# Altium PCB PCB1.PcbDoc (part 1 of 5)
Units mm, origin at the board's own origin, x right, y up, seen from the top; angles counter-clockwise.
Board outline 130 x 90 mm, 4 copper layers (Top Layer, Int 1 (GND), Int 2 (PWR), Bottom Layer), stack 1.466 mm thick; 419 components, 281 nets, 1355 pads, 522 vias.
Unrouted connection lines stored in the file: 26.
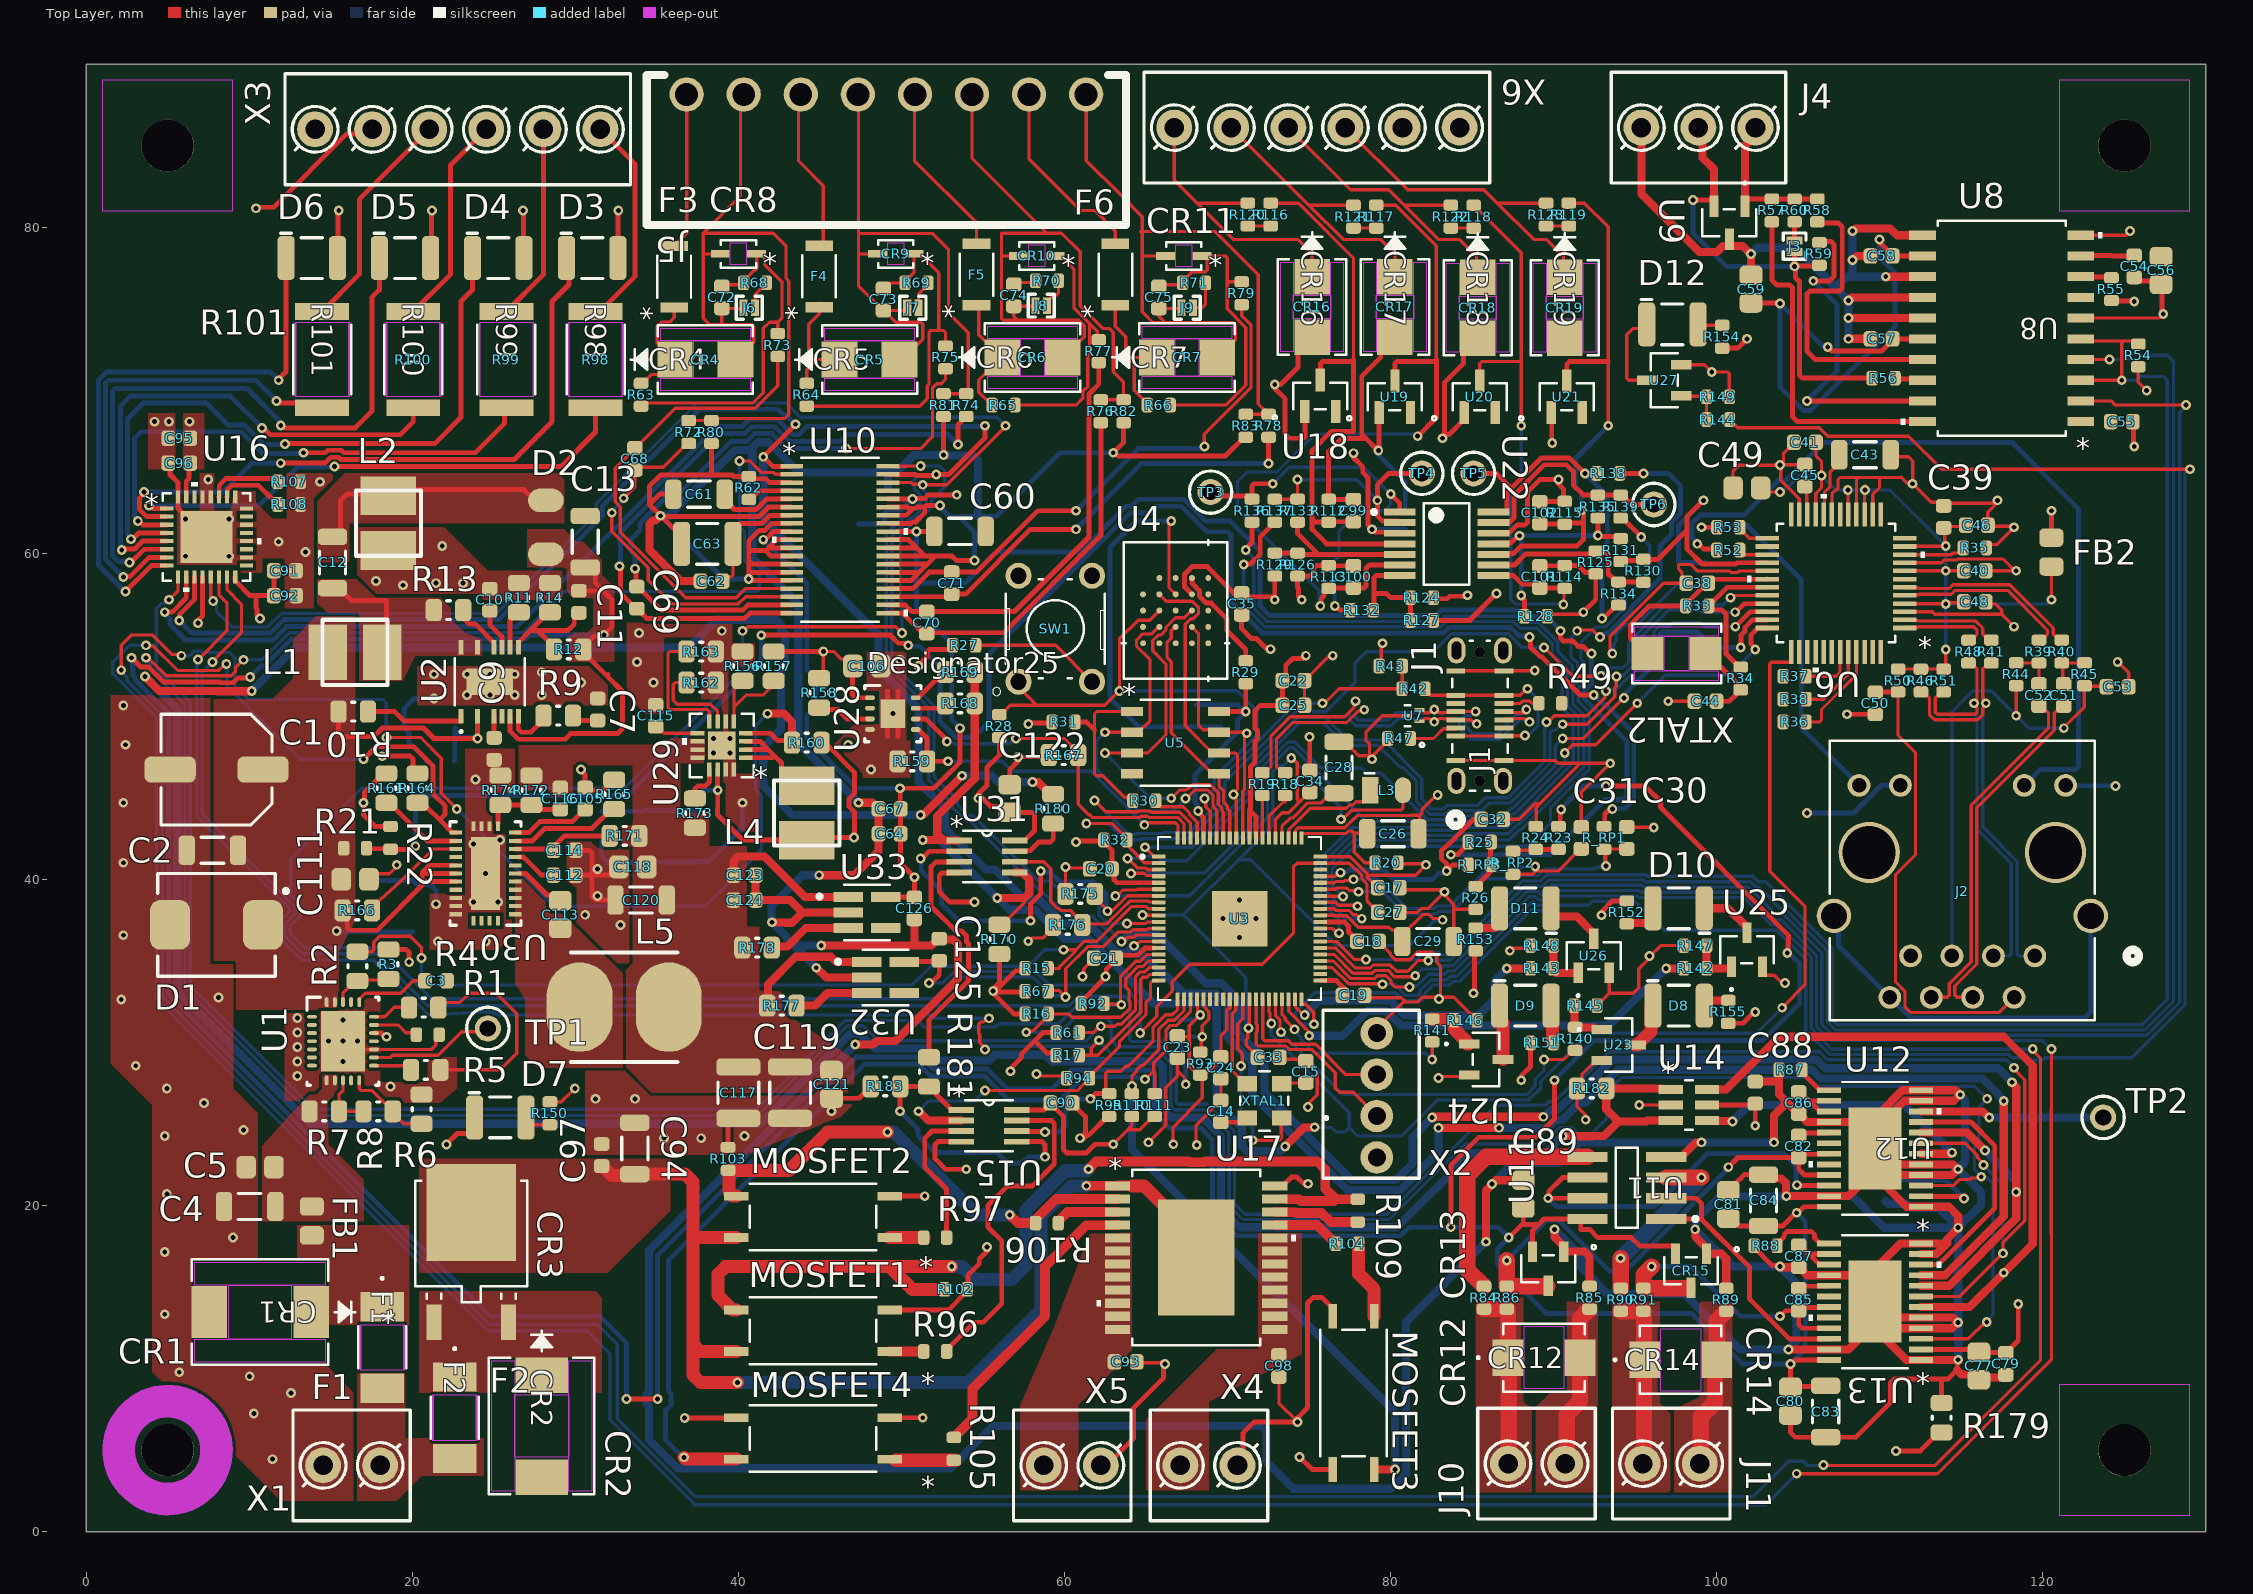
[diagram p0: Top Layer view]
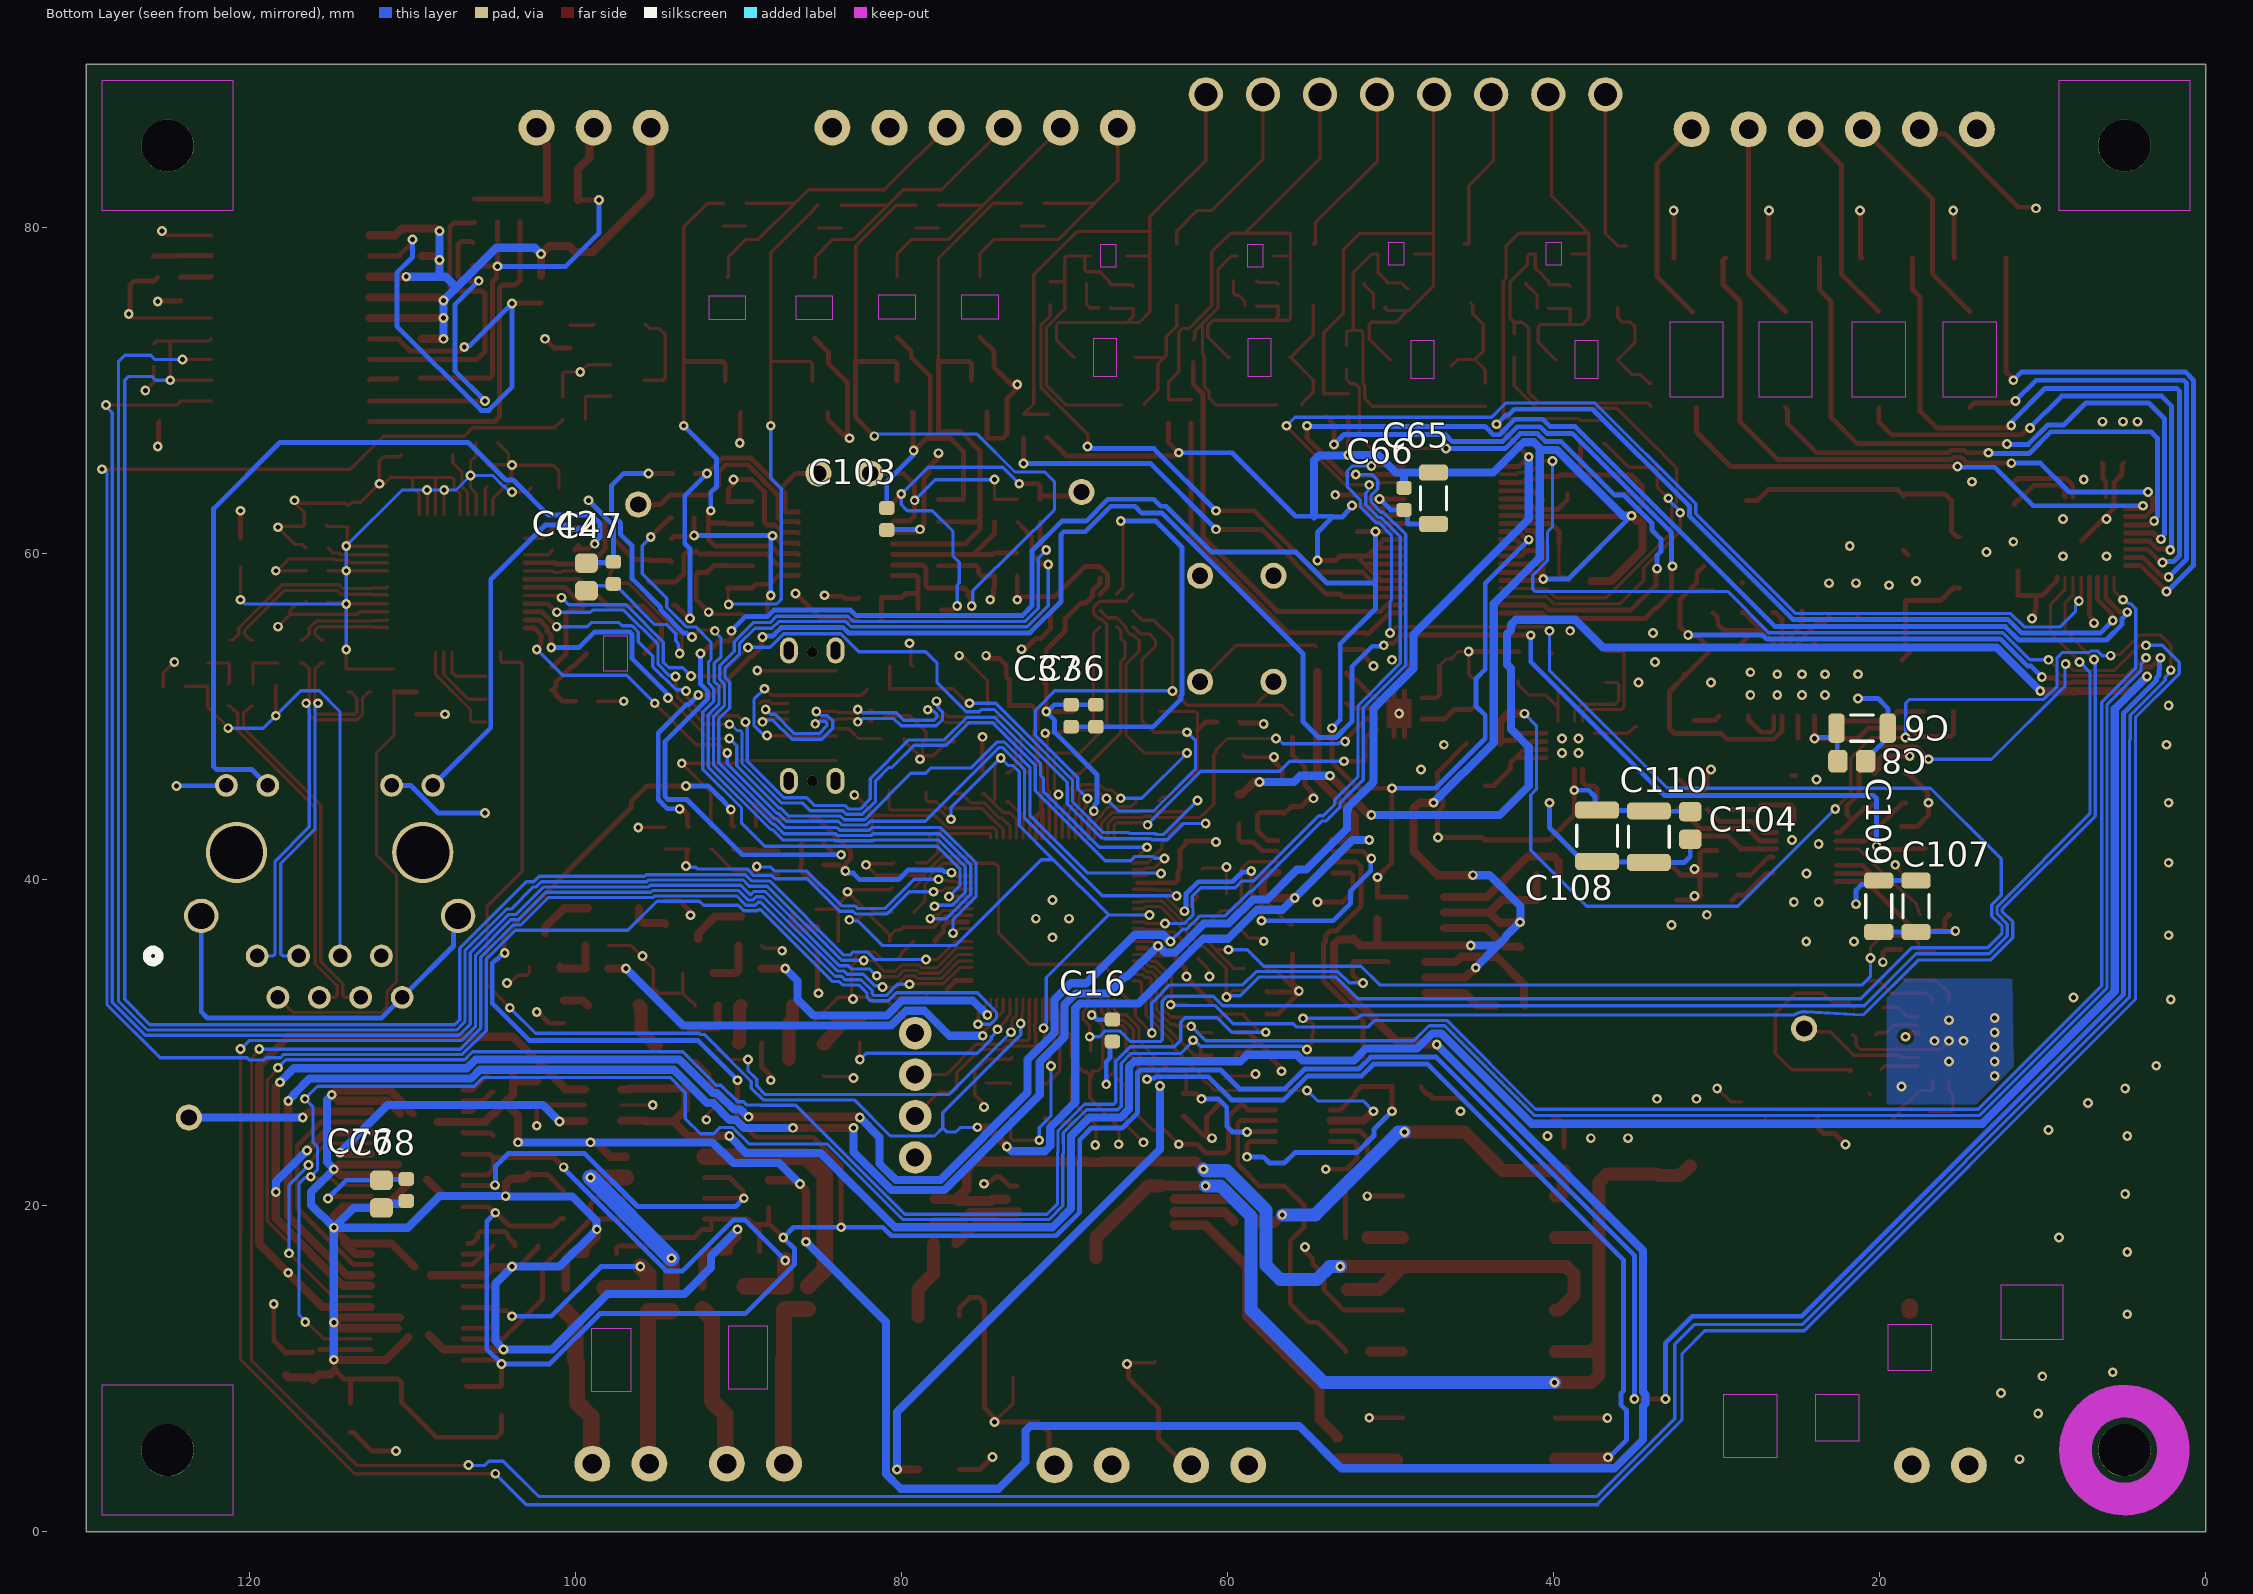
[diagram p1: Bottom Layer view, seen from below]
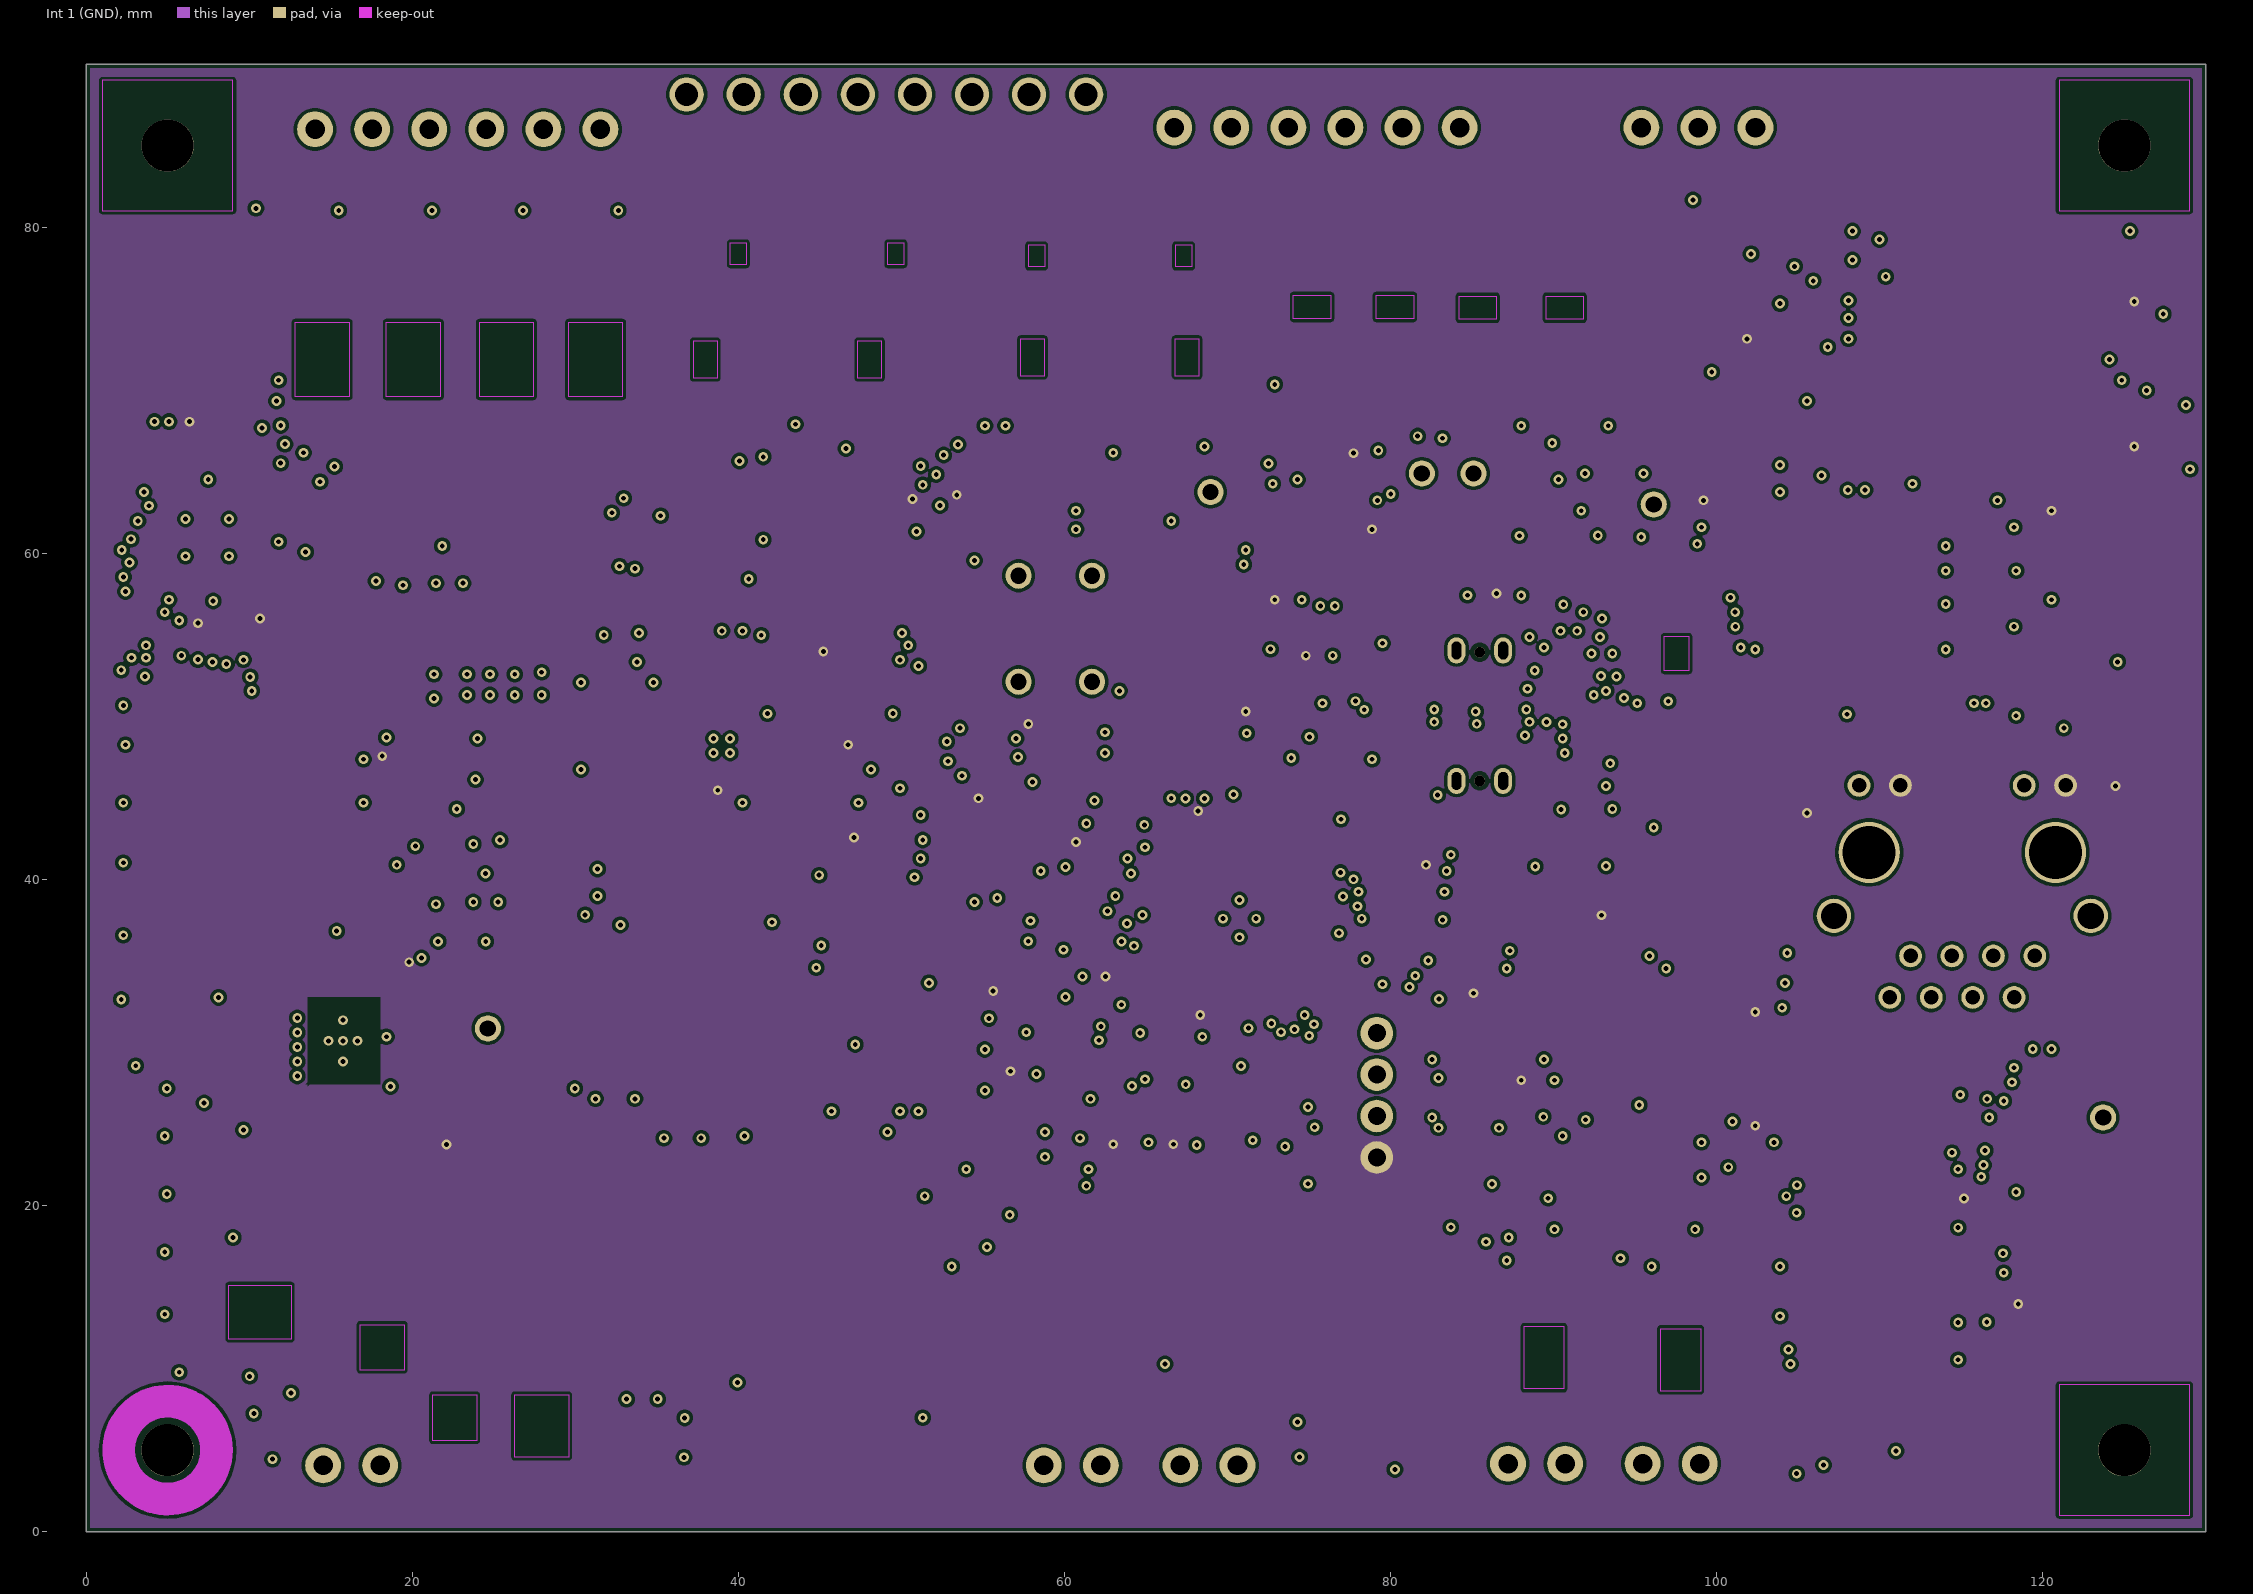
[diagram p2: Int 1 (GND)]
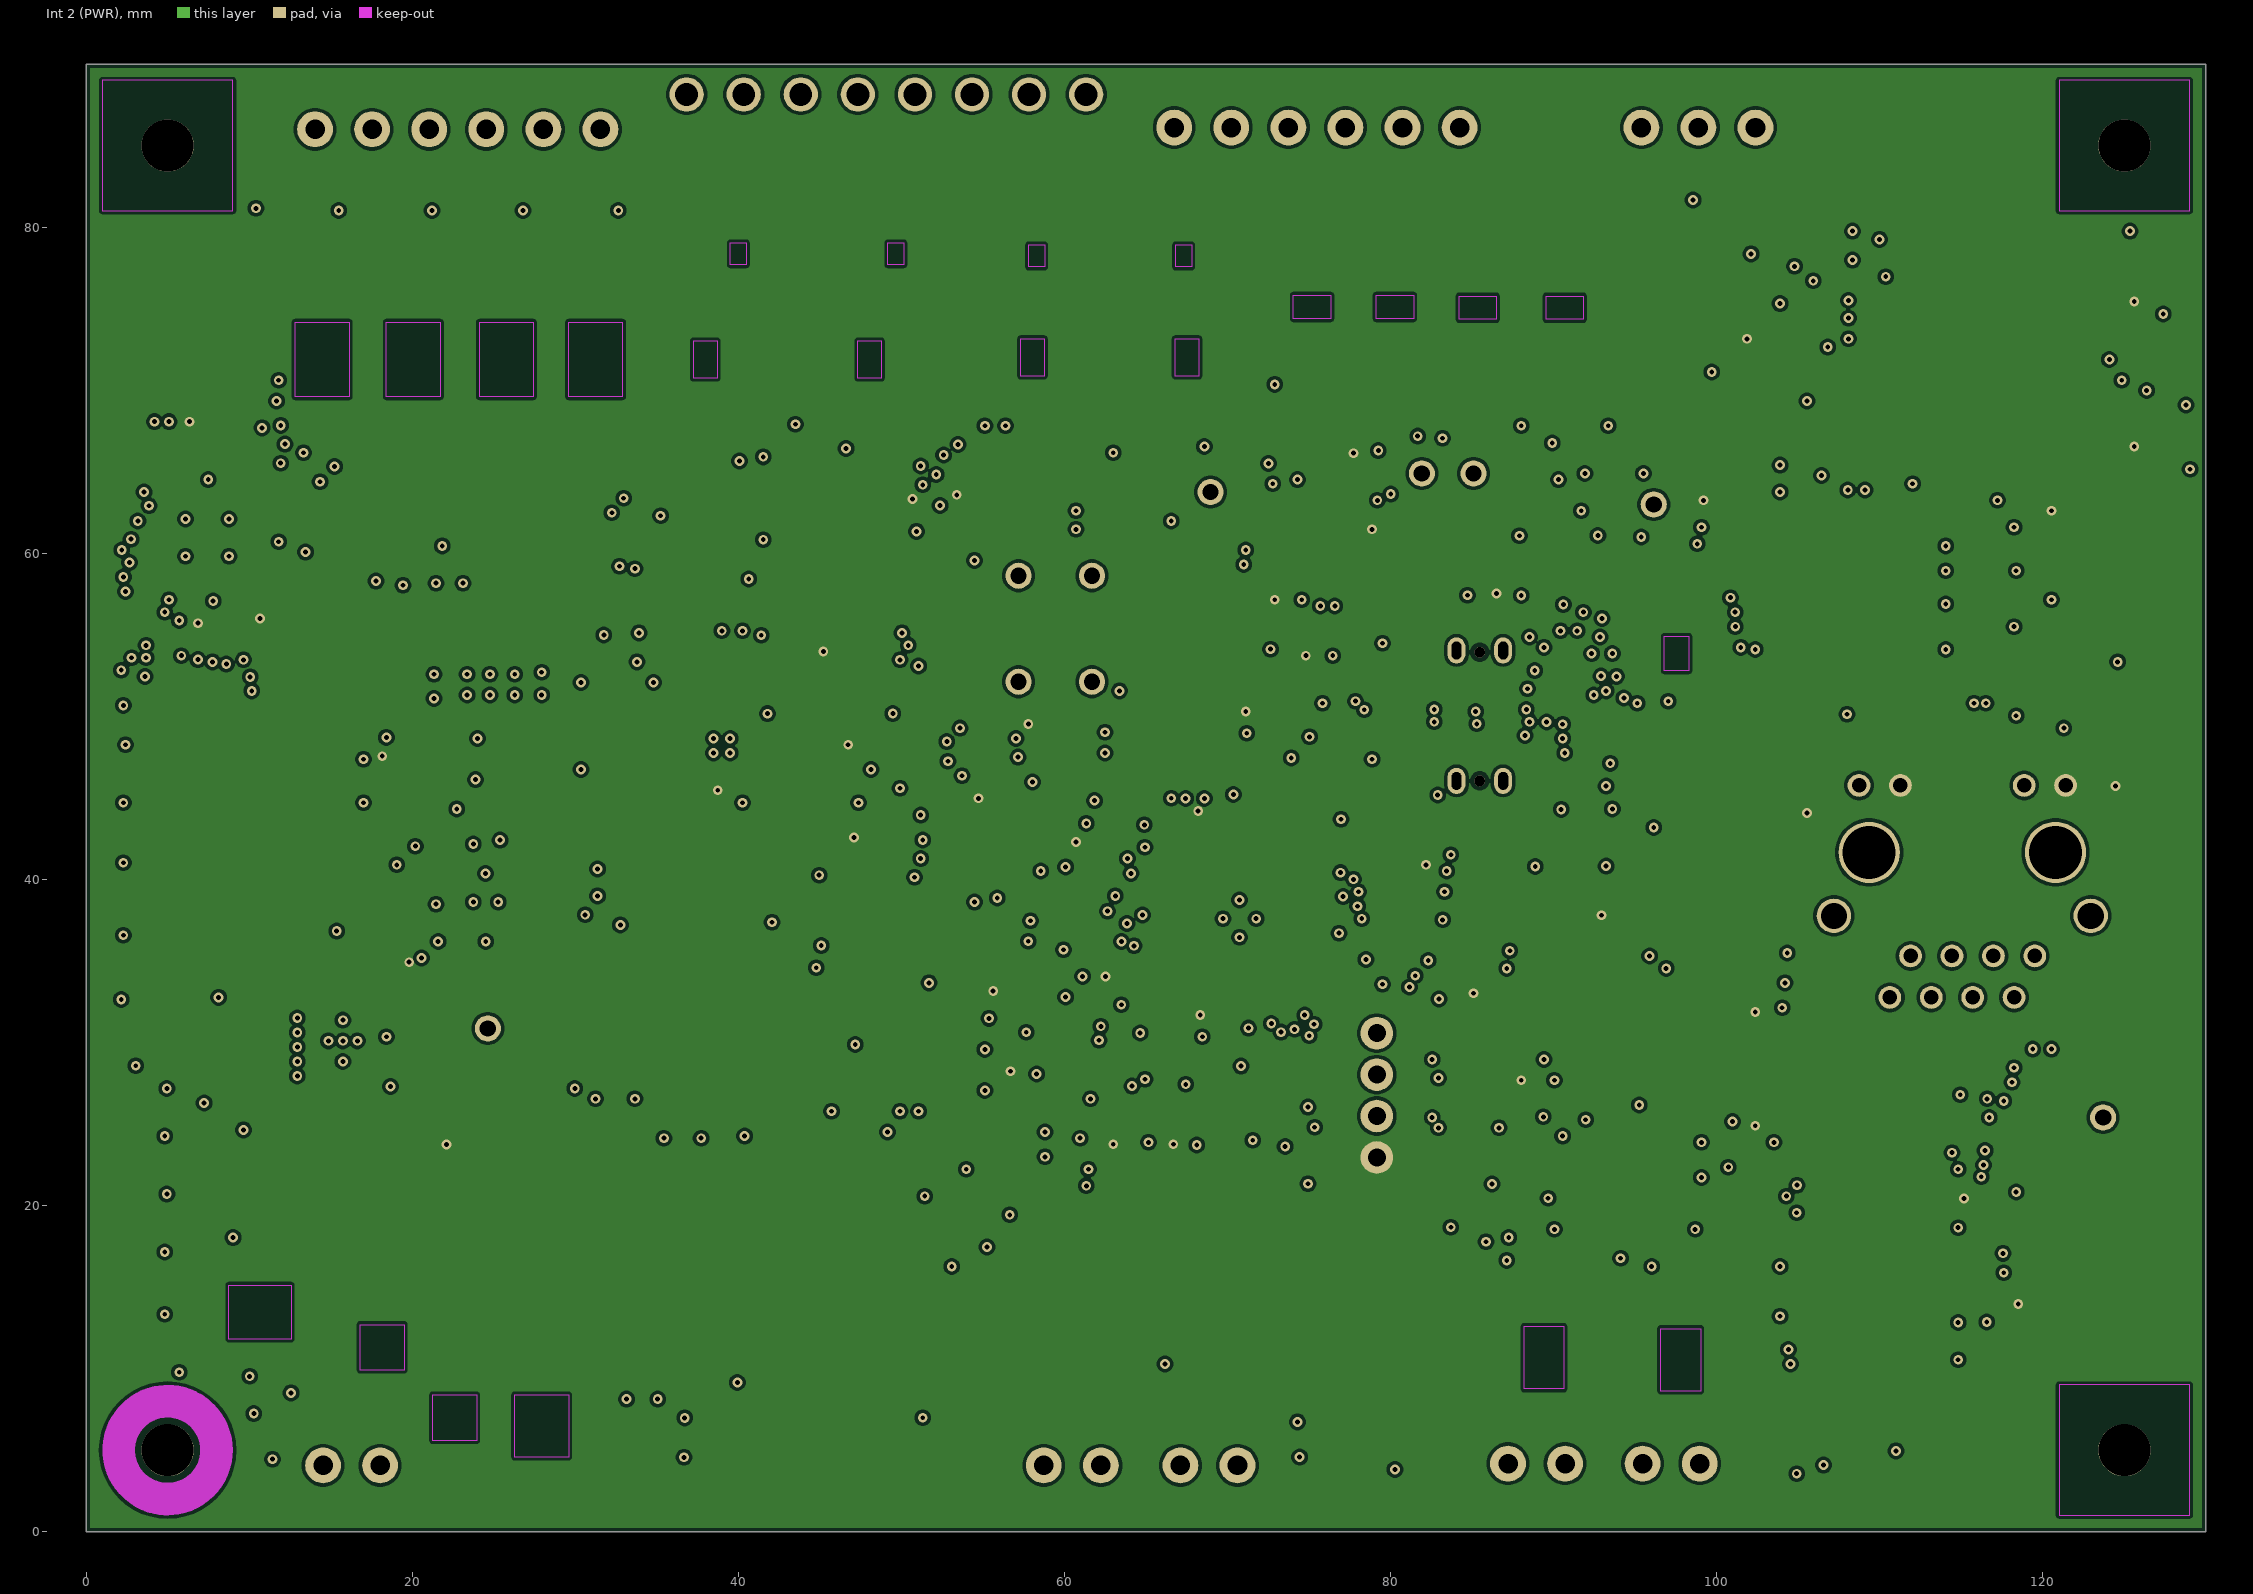
[diagram p3: Int 2 (PWR)]
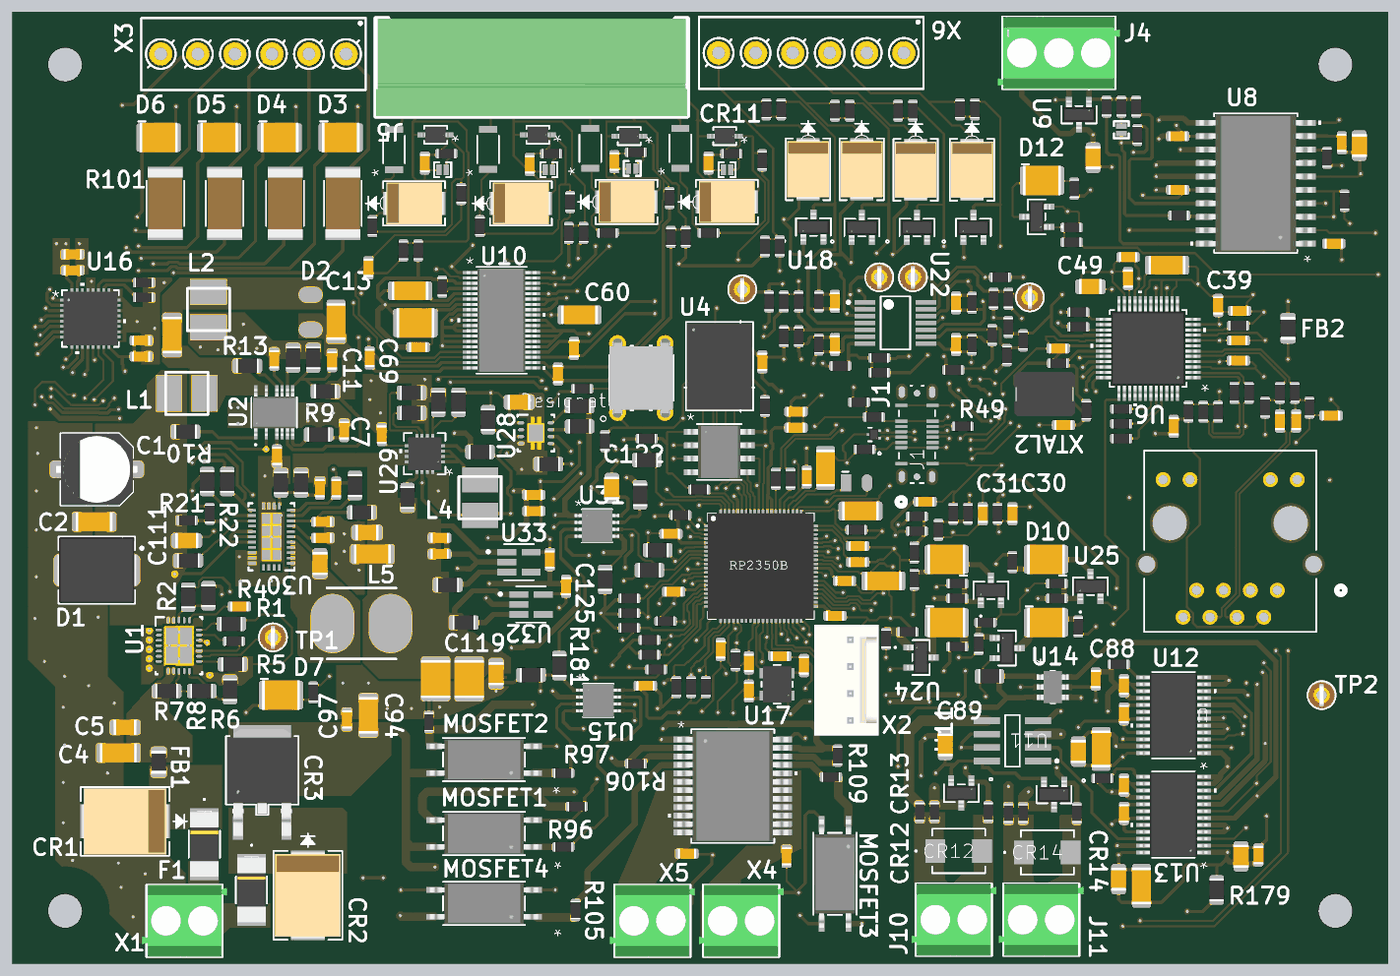
[diagram p8: 3D render of the assembled board from above, using the file's embedded part models]
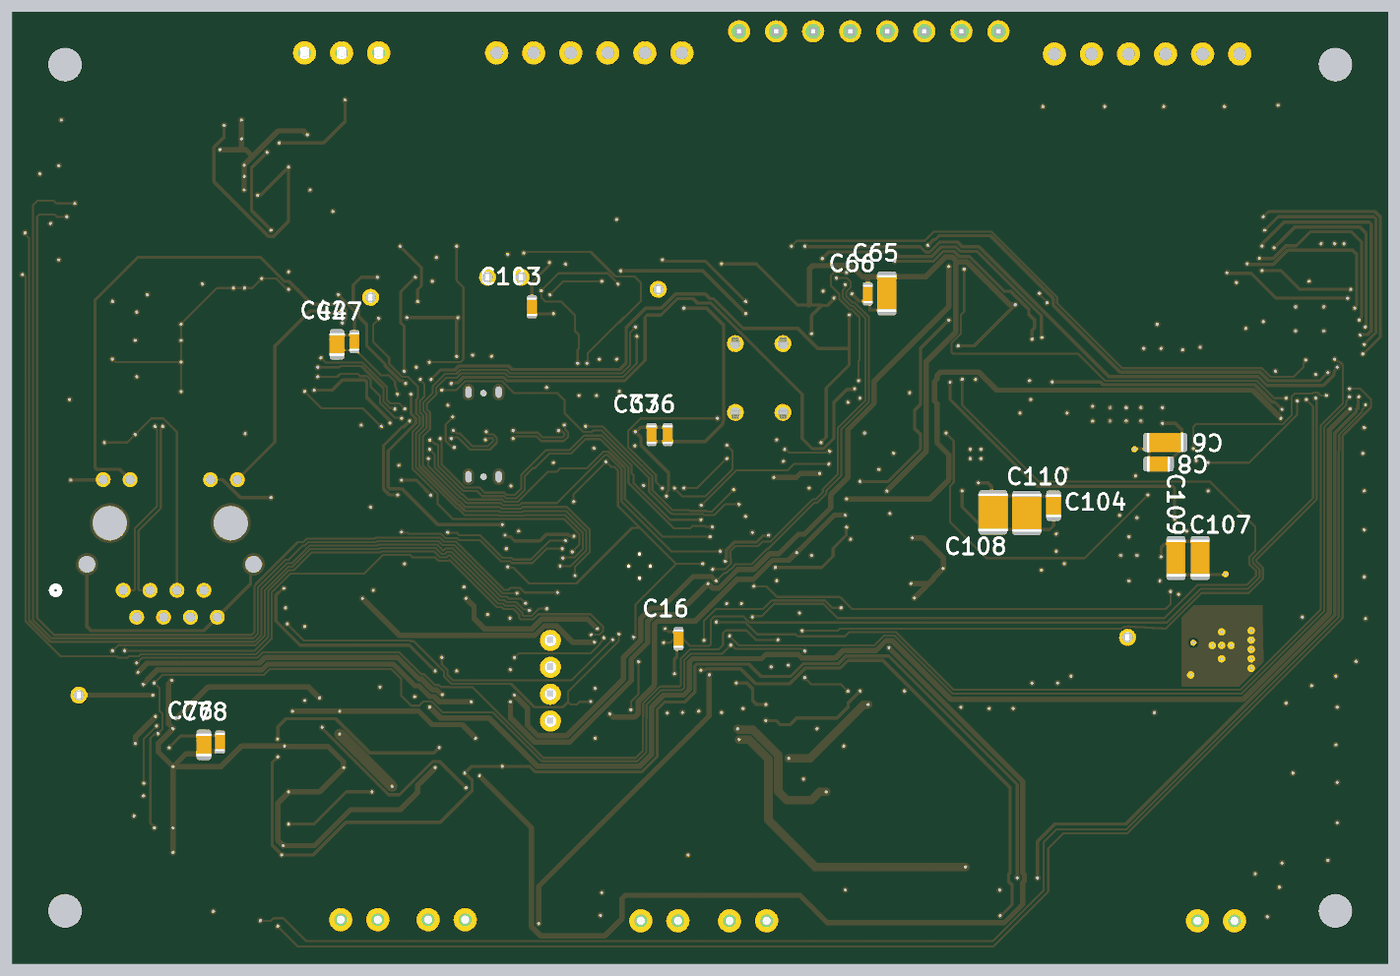
[diagram p9: 3D render of the assembled board from below, using the file's embedded part models]

## Layer stack, top to bottom
Top Solder: solder mask 0.0254, SM-001, Dk 3.5
Top Layer: signal copper 0.018
Dielectric 1: prepreg 0.115, FR4, Dk 4.2
Int 1 (GND): signal copper 0.018
Dielectric5: dielectric 1.164, FR-4, Dk 4.8
Int 2 (PWR): signal copper 0.018
Dielectric 3: prepreg 0.115, FR4, Dk 4.2
Bottom Layer: signal copper 0.018
Bottom Solder: solder mask 0.0254, SM-001, Dk 3.5

## Board outline
0,0 0,90 130,90 130,0

## Design rules (kind name [scope] priority, off if disabled: settings)
AcuteAngle [All] p1: minimum=3.50000000000000E+0001 checktracksonly=FALSE
BoardOutlineClearance "BoardOutlineClearance 1" [All] p1: gap=0.25 ignorepadtopadclearanceinfootprint=FALSE except(0: Arc-SplitContinuation Track-SplitContinuation SMDPad-SplitContinuation THPad-SplitContinuation Via-SplitContinuation Fill-SplitContinuation Poly-SplitContinuation Region-SplitContinuation Text-SplitContinuation) // Milling
BoardOutlineClearance "BoardOutlineClearance 2" [All] p2: gap=0.4 ignorepadtopadclearanceinfootprint=FALSE except(0: Arc-SplitContinuation Track-SplitContinuation SMDPad-SplitContinuation THPad-SplitContinuation Via-SplitContinuation Fill-SplitContinuation Poly-SplitContinuation Region-SplitContinuation Text-SplitContinuation) // V-Cut
Clearance USB_Pair_Clearance [InDifferentialPair('USB') vs InDifferentialPair('USB')] p1: gap=0.15 ignorepadtopadclearanceinfootprint=FALSE
Clearance Clearance_RP2350_PadTrack [IsPad AND InComponent('U3') vs IsTrack] p2: gap=0.125 ignorepadtopadclearanceinfootprint=FALSE
Clearance Clearance_RP2350 [IsPad AND InComponent('U3') vs IsPad AND InComponent('U3')] p3: gap=0.125 ignorepadtopadclearanceinfootprint=FALSE
Clearance "Clearance 3 Oz" [All] p4 off: gap=0.35 ignorepadtopadclearanceinfootprint=FALSE except(0.25: Arc-Hole Track-Hole SMDPad-Hole THPad-Hole Via-Hole Fill-Hole Poly-Hole Region-Hole Text-Hole)
Clearance "Clearance 2 Oz" [All] p5 off: gap=0.3 ignorepadtopadclearanceinfootprint=FALSE except(0.25: Arc-Hole Track-Hole SMDPad-Hole THPad-Hole Via-Hole Fill-Hole Poly-Hole Region-Hole Text-Hole)
Clearance "Clearance-1 1 Oz" [All] p6 off: gap=0.2 ignorepadtopadclearanceinfootprint=FALSE except(0.25: Arc-Hole Track-Hole SMDPad-Hole THPad-Hole Via-Hole Fill-Hole Poly-Hole Region-Hole Text-Hole) // Standart
Clearance "Clearance-2 1 Oz" [All] p7 off: gap=0.15 ignorepadtopadclearanceinfootprint=FALSE except(0.2: Arc-Fill Arc-Poly Track-Fill Track-Poly SMDPad-Fill SMDPad-Poly THPad-Fill THPad-Poly Via-Fill Via-Poly Fill-Fill Fill-Poly Poly-Poly; 0.25: Arc-Hole Track-Hole SMDPad-Hole THPad-Hole Via-Hole Fill-Hole Poly-Hole Region-Hole Text-Hole) // Advance
Clearance "Clearance-1 1/2 Oz" [All] p8: gap=0.125 ignorepadtopadclearanceinfootprint=FALSE except(0.19: SMDPad-SMDPad; 0.2: Arc-Fill Arc-Poly Track-Fill Track-Poly SMDPad-Fill SMDPad-Poly THPad-Fill THPad-Poly Via-Fill Via-Poly Fill-Fill Fill-Poly Poly-Poly Poly-Region Poly-Text; 0.25: Arc-Hole Track-Hole SMDPad-Hole THPad-Hole Via-Hole Fill-Hole Poly-Hole Region-Hole Text-Hole) // Standart
Clearance "Clearance-2 1/2 Oz" [All] p9 off: gap=0.1 ignorepadtopadclearanceinfootprint=FALSE except(0.15: Arc-Fill Arc-Poly Track-Fill Track-Poly SMDPad-SMDPad SMDPad-Fill SMDPad-Poly THPad-Fill THPad-Poly Via-Fill Via-Poly Fill-Fill Fill-Poly Poly-Poly Poly-Region Poly-Text; 0.25: Arc-Hole Track-Hole SMDPad-Hole THPad-Hole Via-Hole Fill-Hole Poly-Hole Region-Hole Text-Hole) // Advance
DiffPairsRouting "DiffPairsRouting 1 Oz" [All] p1 off: maxlimit=0.254 minlimit=0.2 mostfreqgap=0.254 toplayer_minwidth=0.2 toplayer_maxwidth=0.381 toplayer_prefwidth=0.381 midlayer1_minwidth=0.2 midlayer1_maxwidth=0.381 midlayer1_prefwidth=0.381 midlayer2_minwidth=0.2 midlayer2_maxwidth=0.381 midlayer2_prefwidth=0.381 bottomlayer_minwidth=0.2 bottomlayer_maxwidth=0.381 bottomlayer_prefwidth=0.381 maxuncoupledlength=12.7
DiffPairsRouting "DiffPairsRouting 1/2 Oz" [All] p2: maxlimit=0.254 minlimit=0.125 mostfreqgap=0.15 toplayer_minwidth=0.15 toplayer_maxwidth=0.2 toplayer_prefwidth=0.2 midlayer1_minwidth=0.15 midlayer1_maxwidth=0.2 midlayer1_prefwidth=0.2 midlayer2_minwidth=0.15 midlayer2_maxwidth=0.2 midlayer2_prefwidth=0.2 bottomlayer_minwidth=0.15 bottomlayer_maxwidth=0.2 bottomlayer_prefwidth=0.2 maxuncoupledlength=12.7
HoleSize HoleSize_ThermalPads_U1 [IsPad And InComponent('U1')] p1: absolutevalues=TRUE maxlimit=5.9 minlimit=0.3 maxpercent=80.000 minpercent=20.000
HoleSize "Minimum HoleSize" [IsPad] p2: absolutevalues=TRUE maxlimit=5.9 minlimit=0.6 maxpercent=80.000 minpercent=20.000
HoleSize "Minimum HoleSize VIA 1" [IsVia] p3: absolutevalues=TRUE maxlimit=5.9 minlimit=0.3 maxpercent=80.000 minpercent=20.000 // Standart
HoleSize "Minimum HoleSize VIA 2" [IsVia] p4: absolutevalues=TRUE maxlimit=5.9 minlimit=0.2 maxpercent=80.000 minpercent=20.000 // Advance
HoleToHoleClearance Hole2HoleClearance [All] p1: gap=0.25 allowstackedmicrovias=FALSE
MinimumAnnularRing "Minimum AR VIA Standart" [IsVia] p1: minimumring=0.15
MinimumAnnularRing "Minimum AR PAD Standart" [IsPAD] p2: minimumring=0.2
MinimumAnnularRing "Minimum AR VIA Advance" [IsVia] p3 off: minimumring=0.1
MinimumAnnularRing "Minimum AR PAD Advance" [IsPAD] p4 off: minimumring=0.15
MinimumSolderMaskSliver "SolderMask Bridge Standart" [All] p1 off: minsoldermaskwidth=0.15 // All Masks
MinimumSolderMaskSliver "SolderMask Bridge Advance" [All] p2: minsoldermaskwidth=0.1 // Mask LDI
PlaneClearance "PlaneClearance 3 Oz" [All] p1: clearance=0.35
PlaneClearance "PlaneClearance 2 Oz" [All] p2: clearance=0.3
PlaneClearance "PlaneClearance 1 Oz" [All] p3: clearance=0.2
PlaneClearance "PlaneClearance-1 1/2 Oz" [All] p4: clearance=0.2 // Standart
PlaneClearance "PlaneClearance-2 1/2 Oz" [All] p5: clearance=0.15 // Advance
PlaneConnect "TermalConnect 3 Oz" [All] p1 off: planeconnectstyle=Relief reliefexpansion=0.2 reliefentries=4 reliefconductorwidth=0.35 reliefairgap=0.35 // Standart
PlaneConnect "TermalConnect 2 Oz" [All] p2 off: planeconnectstyle=Relief reliefexpansion=0.2 reliefentries=4 reliefconductorwidth=0.3 reliefairgap=0.3 // Standart
PlaneConnect "TermalConnect-1 1 Oz" [All] p3 off: planeconnectstyle=Relief reliefexpansion=0.2 reliefentries=4 reliefconductorwidth=0.2 reliefairgap=0.2 // Standart
PlaneConnect "TermalConnect-2 1 Oz" [All] p4 off: pad.planeconnectstyle=Relief pad.reliefexpansion=0.15 pad.reliefentries=4 pad.reliefconductorwidth=0.2 pad.reliefairgap=0.2 via.planeconnectstyle=Direct via.reliefexpansion=0.15 via.reliefentries=4 via.reliefconductorwidth=0.15 via.reliefairgap=0.15 // Advance
PlaneConnect "TermalConnect-1 1/2 Oz" [All] p5: planeconnectstyle=Relief reliefexpansion=0.2 reliefentries=4 reliefconductorwidth=0.2 reliefairgap=0.2 // Standart
PlaneConnect "TermalConnect-2 1/2 Oz" [All] p6 off: pad.planeconnectstyle=Relief pad.reliefexpansion=0.15 pad.reliefentries=4 pad.reliefconductorwidth=0.15 pad.reliefairgap=0.15 via.planeconnectstyle=Direct via.reliefexpansion=0.15 via.reliefentries=4 via.reliefconductorwidth=0.15 via.reliefairgap=0.15 // Advance
PolygonConnect "PolygonConnect 3 Oz" [All] p1 off: thpad.connectstyle=Relief thpad.reliefconductorwidth=0.35 thpad.reliefentries=4 thpad.polygonreliefangle="90 Angle" thpad.airgapwidth=0.35 smdpad.connectstyle=Relief smdpad.reliefconductorwidth=0.35 smdpad.reliefentries=4 smdpad.polygonreliefangle="90 Angle" smdpad.airgapwidth=0.35 via.connectstyle=Direct via.reliefconductorwidth=0.254 via.reliefentries=4 via.polygonreliefangle="90 Angle" via.airgapwidth=0.254
PolygonConnect "PolygonConnect 2 Oz" [All] p2 off: thpad.connectstyle=Relief thpad.reliefconductorwidth=0.3 thpad.reliefentries=4 thpad.polygonreliefangle="90 Angle" thpad.airgapwidth=0.3 smdpad.connectstyle=Relief smdpad.reliefconductorwidth=0.3 smdpad.reliefentries=4 smdpad.polygonreliefangle="90 Angle" smdpad.airgapwidth=0.3 via.connectstyle=Direct via.reliefconductorwidth=0.254 via.reliefentries=4 via.polygonreliefangle="90 Angle" via.airgapwidth=0.254
PolygonConnect "PolygonConnect-1 1 Oz" [All] p3 off: thpad.connectstyle=Relief thpad.reliefconductorwidth=0.2 thpad.reliefentries=4 thpad.polygonreliefangle="90 Angle" thpad.airgapwidth=0.2 smdpad.connectstyle=Relief smdpad.reliefconductorwidth=0.2 smdpad.reliefentries=4 smdpad.polygonreliefangle="90 Angle" smdpad.airgapwidth=0.2 via.connectstyle=Direct via.reliefconductorwidth=0.254 via.reliefentries=4 via.polygonreliefangle="90 Angle" via.airgapwidth=0.254 // Standart
PolygonConnect "PolygonConnect-2 1 Oz" [All] p4 off: thpad.connectstyle=Relief thpad.reliefconductorwidth=0.15 thpad.reliefentries=4 thpad.polygonreliefangle="90 Angle" thpad.airgapwidth=0.15 smdpad.connectstyle=Relief smdpad.reliefconductorwidth=0.15 smdpad.reliefentries=4 smdpad.polygonreliefangle="90 Angle" smdpad.airgapwidth=0.15 via.connectstyle=Direct via.reliefconductorwidth=0.254 via.reliefentries=4 via.polygonreliefangle="90 Angle" via.airgapwidth=0.254 // Advance
PolygonConnect "PolygonConnect-1 1/2 Oz" [All] p5: connectstyle=Direct reliefconductorwidth=0.15 reliefentries=4 polygonreliefangle="90 Angle" airgapwidth=0.2 // Standart
PolygonConnect "PolygonConnect-2 1/2 Oz" [All] p6 off: thpad.connectstyle=Relief thpad.reliefconductorwidth=0.125 thpad.reliefentries=4 thpad.polygonreliefangle="90 Angle" thpad.airgapwidth=0.15 smdpad.connectstyle=Relief smdpad.reliefconductorwidth=0.125 smdpad.reliefentries=4 smdpad.polygonreliefangle="90 Angle" smdpad.airgapwidth=0.15 via.connectstyle=Direct via.reliefconductorwidth=0.254 via.reliefentries=4 via.polygonreliefangle="90 Angle" via.airgapwidth=0.254 // Advance
RoutingCorners [All] p1 off: cornerstyle=45-Degree minsetback=2.54 maxsetback=2.54
RoutingVias [All] p1: holewidth=0.3 width=0.6 viastyle="Through Hole" minholewidth=0.2 minwidth=0.4 maxholewidth=5.9 maxwidth=6.4
SilkToSilkClearance Silk2SilkClearance [All] p1 off: silktosilkclearance=0.15
SilkToSolderMaskClearance Silk2SolderMaskClearance [IsPad] p1 off: minsilkscreentomaskgap=0.15 clearancetoexposedcopper=TRUE
SolderMaskExpansion SolderMask_RP2350 [IsPad AND InComponent('U3')] p1: expansion=0.025 istentingtop=FALSE
SolderMaskExpansion SolderMaskExpansion-1 [All] p2: expansion=0.05 istentingtop=FALSE // Standart
SolderMaskExpansion "SolderMaskExpansion LDI" [All] p3: expansion=0.025 istentingtop=FALSE // Advance
SupplyNets "Schematic Supply Nets_85" [InNet('VIN_PROTECTED')] p1: voltage=0.000
SupplyNets "Schematic Supply Nets_84" [InNet('+5V_ANALOG')] p2: voltage=0.000
SupplyNets "Schematic Supply Nets_83" [InNet('DI_READY_N')] p3: voltage=0.000
SupplyNets "Schematic Supply Nets_82" [InNet('DO1_FAULT')] p4: voltage=0.000
SupplyNets "Schematic Supply Nets_81" [InNet('ETH_INT_N')] p5: voltage=0.000
SupplyNets "Schematic Supply Nets_80" [InNet('AO_LATCH')] p6: voltage=0.000
SupplyNets "Schematic Supply Nets_79" [InNet('+3V3_RS485_ISO')] p7: voltage=0.000
SupplyNets "Schematic Supply Nets_78" [InNet('AI3_RET')] p8: voltage=0.000
SupplyNets "Schematic Supply Nets_77" [InNet('WD_ENABLE')] p9: voltage=0.000
SupplyNets "Schematic Supply Nets_76" [InNet('+3V3_DIG')] p10: voltage=0.000
SupplyNets "Schematic Supply Nets_75" [InNet('AO0_CLEAR')] p11: voltage=0.000
SupplyNets "Schematic Supply Nets_74" [InNet('AO_ENABLE_REQ')] p12: voltage=0.000
SupplyNets "Schematic Supply Nets_73" [InNet('PHY_RX_N')] p13: voltage=0.000
SupplyNets "Schematic Supply Nets_72" [InNet('RS485_DE_RE')] p14: voltage=0.000
SupplyNets "Schematic Supply Nets_71" [InNet('RS485_TX')] p15: voltage=0.000
SupplyNets "Schematic Supply Nets_70" [InNet('USB_DM')] p16: voltage=0.000
SupplyNets "Schematic Supply Nets_69" [InNet('BOARD_SPI_MISO')] p17: voltage=0.000
SupplyNets "Schematic Supply Nets_68" [InNet('AI0_RET')] p18: voltage=0.000
SupplyNets "Schematic Supply Nets_67" [InNet('AO_15V_MON')] p19: voltage=0.000
SupplyNets "Schematic Supply Nets_66" [InNet('ETH_SCK')] p20: voltage=0.000
SupplyNets "Schematic Supply Nets_65" [InNet('AO_SAFE_EN')] p21: voltage=0.000
SupplyNets "Schematic Supply Nets_64" [InNet('PWR_IN_FAULT_N')] p22: voltage=0.000
SupplyNets "Schematic Supply Nets_63" [InNet('PHY_TX_N')] p23: voltage=0.000
SupplyNets "Schematic Supply Nets_62" [InNet('PHY_YELLOW')] p24: voltage=0.000
SupplyNets "Schematic Supply Nets_61" [InNet('PWR_5V_PGOOD_N')] p25: voltage=0.000
SupplyNets "Schematic Supply Nets_60" [InNet('BOARD_SPI_MOSI')] p26: voltage=0.000
SupplyNets "Schematic Supply Nets_59" [InNet('PHY_RX_P')] p27: voltage=0.000
SupplyNets "Schematic Supply Nets_58" [InNet('DO1_CMD')] p28: voltage=0.000
SupplyNets "Schematic Supply Nets_57" [InNet('UIC1_IN')] p29: voltage=0.000
SupplyNets "Schematic Supply Nets_56" [InNet('USB_VBUS_DET')] p30: voltage=0.000
SupplyNets "Schematic Supply Nets_55" [InNet('+1V1_CORE')] p31: voltage=0.000
SupplyNets "Schematic Supply Nets_54" [InNet('AI2_RET')] p32: voltage=0.000
SupplyNets "Schematic Supply Nets_53" [InNet('AO1_CLEAR')] p33: voltage=0.000
SupplyNets "Schematic Supply Nets_52" [InNet('MANUAL_RESET_N')] p34: voltage=0.000
SupplyNets "Schematic Supply Nets_51" [InNet('RS485_RX')] p35: voltage=0.000
SupplyNets "Schematic Supply Nets_50" [InNet('LED_DO')] p36: voltage=0.000
SupplyNets "Schematic Supply Nets_49" [InNet('+5V_PRE')] p37: voltage=0.000
SupplyNets "Schematic Supply Nets_48" [InNet('SWD_IO')] p38: voltage=0.000
SupplyNets "Schematic Supply Nets_47" [InNet('QSPI_SD0')] p39: voltage=0.000
SupplyNets "Schematic Supply Nets_46" [InNet('QSPI_SD3')] p40: voltage=0.000
SupplyNets "Schematic Supply Nets_45" [InNet('GND_RS485_ISO')] p41: voltage=0.000
SupplyNets "Schematic Supply Nets_44" [InNet('+15V_AO')] p42: voltage=0.000
SupplyNets "Schematic Supply Nets_43" [InNet('ETH_MISO')] p43: voltage=0.000
SupplyNets "Schematic Supply Nets_42" [InNet('LED_AO')] p44: voltage=0.000
SupplyNets "Schematic Supply Nets_41" [InNet('USB_DP')] p45: voltage=0.000
SupplyNets "Schematic Supply Nets_40" [InNet('DI_CS_N')] p46: voltage=0.000
SupplyNets "Schematic Supply Nets_39" [InNet('QSPI_SD1')] p47: voltage=0.000
SupplyNets "Schematic Supply Nets_38" [InNet('PWR_IN_IMON')] p48: voltage=0.000
SupplyNets "Schematic Supply Nets_37" [InNet('LED_RS485')] p49: voltage=0.000
SupplyNets "Schematic Supply Nets_36" [InNet('SWD_CLK')] p50: voltage=0.000
SupplyNets "Schematic Supply Nets_35" [InNet('AI1_RET')] p51: voltage=0.000
SupplyNets "Schematic Supply Nets_34" [InNet('AGND')] p52: voltage=0.000
SupplyNets "Schematic Supply Nets_33" [InNet('PHY_GREEN')] p53: voltage=0.000
SupplyNets "Schematic Supply Nets_32" [InNet('ADC_RST_PD_N')] p54: voltage=0.000
SupplyNets "Schematic Supply Nets_31" [InNet('VIN_PROTECTED_MON')] p55: voltage=0.000
SupplyNets "Schematic Supply Nets_30" [InNet('WD_KICK')] p56: voltage=0.000
SupplyNets "Schematic Supply Nets_29" [InNet('PWR_3V3_PGOOD_N')] p57: voltage=0.000
SupplyNets "Schematic Supply Nets_28" [InNet('ETH_CS_N')] p58: voltage=0.000
SupplyNets "Schematic Supply Nets_27" [InNet('VFIELD_OUT')] p59: voltage=0.000
SupplyNets "Schematic Supply Nets_26" [InNet('DO_SAFE_EN')] p60: voltage=0.000
SupplyNets "Schematic Supply Nets_25" [InNet('SYS_RESET_N')] p61: voltage=0.000
SupplyNets "Schematic Supply Nets_24" [InNet('NODE_AI3_PROT')] p62: voltage=0.000
SupplyNets "Schematic Supply Nets_23" [InNet('NODE_AI2_PROT')] p63: voltage=0.000
SupplyNets "Schematic Supply Nets_22" [InNet('PHY_TX_P')] p64: voltage=0.000
SupplyNets "Schematic Supply Nets_21" [InNet('LED_RUN')] p65: voltage=0.000
SupplyNets "Schematic Supply Nets_20" [InNet('NODE_AI1_PROT')] p66: voltage=0.000
SupplyNets "Schematic Supply Nets_19" [InNet('UIC3_IN')] p67: voltage=0.000
SupplyNets "Schematic Supply Nets_18" [InNet('LED_FAULT')] p68: voltage=0.000
SupplyNets "Schematic Supply Nets_17" [InNet('NODE_AI0_PROT')] p69: voltage=0.000
SupplyNets "Schematic Supply Nets_16" [InNet('UIC0_IN')] p70: voltage=0.000
SupplyNets "Schematic Supply Nets_15" [InNet('BOARD_SPI_SCK')] p71: voltage=0.000
SupplyNets "Schematic Supply Nets_14" [InNet('GND_SYS')] p72: voltage=0.000
SupplyNets "Schematic Supply Nets_13" [InNet('DO2_CMD')] p73: voltage=0.000
SupplyNets "Schematic Supply Nets_12" [InNet('+3V3_ANALOG')] p74: voltage=0.000
SupplyNets "Schematic Supply Nets_11" [InNet('QSPI_SCLK')] p75: voltage=0.000
SupplyNets "Schematic Supply Nets_10" [InNet('ADC_CS_N')] p76: voltage=0.000
SupplyNets "Schematic Supply Nets_9" [InNet('PSRAM_CS_N')] p77: voltage=0.000
SupplyNets "Schematic Supply Nets_8" [InNet('UIC2_IN')] p78: voltage=0.000
SupplyNets "Schematic Supply Nets_7" [InNet('QSPI_SS')] p79: voltage=0.000
SupplyNets "Schematic Supply Nets_6" [InNet('ANA_5V_MON')] p80: voltage=0.000
SupplyNets "Schematic Supply Nets_5" [InNet('AO0_SDO_TO_AO1')] p81: voltage=0.000
SupplyNets "Schematic Supply Nets_4" [InNet('QSPI_SD2')] p82: voltage=0.000
SupplyNets "Schematic Supply Nets_3" [InNet('ETH_MOSI')] p83: voltage=0.000
SupplyNets "Schematic Supply Nets_2" [InNet('DO_ENABLE_REQ')] p84: voltage=0.000
SupplyNets "Schematic Supply Nets_1" [InNet('BOARD_FAULT_N')] p85: voltage=0.000
SupplyNets "Schematic Supply Nets" [InNet('DO2_FAULT')] p86: voltage=0.000
UnRoutedNet [All] p1: checkbadconnections=TRUE
Width "Width 3 Oz" [All] p1 off: maxlimit=10 minlimit=0.35 preferedwidth=0.4 checkconnectedcopper=TRUE
Width "Width 1 Oz" [All] p2 off: maxlimit=10 minlimit=0.15 preferedwidth=0.2 checkconnectedcopper=TRUE
Width "Width 1/2 Oz" [All] p3: maxlimit=10 minlimit=0.1 preferedwidth=0.125 checkconnectedcopper=TRUE
Width "Width 2 Oz" [All] p4 off: maxlimit=10 minlimit=0.3 preferedwidth=0.35 minimp=50.000000 maximp=50.000000 favimp=50.000000 checkconnectedcopper=TRUE
Width Width_Default [All] p5: maxlimit=0.4 minlimit=0.125 preferedwidth=0.2
20 further rules are at their usual default settings.

## Classes and differential pairs
component class 04_MEMORY: C35 C36 C37 R27 R28 R29 R30 R31 SW1 U4 U5
component class 02A_POWER_RAILS: C6 C7 C8 C9 C10 C11 C12 C13 C104 C105 C106 C107 C108 C109 C110 C111 C112 C113 C114 C115 C116 C117 C118 C119 C120 C121 C122 C123 C124 C125 C126 D2 L1 L2 L4 L5 R9 R10 R11 R12 R13 R14 R156 R157 R158 R159 R160 R161 R162 R163 R164 R165 R166 R167 R168 R169 R170 R171 R172 R173 R174 R175 R176 R177 R178 R179 R180 R181 R182 R183 U2 U28 U29 U30 U31 U32 U33
component class 11_LEDS: D7 D8 D9 D10 D11 D12 R140 R141 R142 R143 R144 R145 R146 R147 R148 R149 R150 R151 R152 R153 R154 R155 U23 U24 U25 U26 U27
component class 10_UNIVERSAL_INPUTS: C99 C100 C101 C102 C103 CR16 CR17 CR18 CR19 R112 R113 R114 R115 R116 R117 R118 R119 R120 R121 R122 R123 R124 R125 R126 R127 R128 R129 R130 R131 R132 R133 R134 R135 R136 R137 R138 R139 TP3 TP4 TP5 TP6 U18 U19 U20 U21 U22 X6
component class 08_ANALOG_OUTPUTS: C76 C77 C78 C79 C80 C81 C82 C83 C84 C85 C86 C87 C88 C89 CR12 CR13 CR14 CR15 J10 J11 R84 R85 R86 R87 R88 R89 R90 R91 TP2 U11 U12 U13 U14
component class 09_DIGITAL_IO: C90 C91 C92 C93 C94 C95 C96 C97 C98 D3 D4 D5 D6 MOSFET1 MOSFET2 MOSFET3 MOSFET4 R92 R93 R94 R95 R96 R97 R98 R99 R100 R101 R102 R103 R104 R105 R106 R107 R108 R109 R110 R111 U15 U16 U17 X3 X4 X5
component class 07_ANALOG_INPUTS: C60 C61 C62 C63 C64 C65 C66 C67 C68 C69 C70 C71 C72 C73 C74 C75 CR4 CR5 CR6 CR7 CR8 CR9 CR10 CR11 F3 F4 F5 F6 J5 J6 J7 J8 J9 R61 R62 R63 R64 R65 R66 R67 R68 R69 R70 R71 R72 R73 R74 R75 R76 R77 R78 R79 R80 R81 R82 R83 U10
component class 06_RS485: C54 C55 C56 C57 C58 C59 J3 J4 R54 R55 R56 R57 R58 R59 R60 U8 U9
component class 05_ETHERNET_USB: C38 C39 C40 C41 C42 C43 C44 C45 C46 C47 C48 C49 C50 C51 C52 C53 C? FB2 J1 J2 R32 R33 R34 R35 R36 R37 R38 R39 R40 R41 R42 R43 R44 R45 R46 R47 R48 R49 R50 R51 R52 R53 U6 U7 XTAL2
component class 03_MCU_RP2350: C14 C15 C16 C17 C18 C19 C20 C21 C22 C23 C24 C25 C26 C27 C28 C29 C30 C31 C32 C33 C34 L3 R15 R16 R17 R18 R19 R20 R21 R22 R23 R24 R25 R26 R_RP1 R_RP2 R_RP3 U3 X2 XTAL1
component class 01_POWER_INPUT: C1 C2 C3 C4 C5 CR1 CR2 CR3 D1 F1 F2 FB1 R1 R2 R3 R4 R5 R6 R7 R8 R? TP1 U1 X1
differential pair ETH_TX: +ETH_TX_P -ETH_TX_N
differential pair ETH_RX: +ETH_RX_P -ETH_RX_N
differential pair USB: +USB_DP -USB_DM
differential pair PHY_TX: +PHY_TX_P -PHY_TX_N
differential pair PHY_RX: +PHY_RX_P -PHY_RX_N

## Components (designator, comment, footprint, x,y, rotation, side; value= is the part's Value field where it differs from the comment)
C1 "Capacitor" C_SMD_Al_D 8.001,46.736 r180 top value=10u
C2 "Capacitor" C_1206 7.747,41.783 r180 top value=1u
C3 "Capacitor" C_0603 21.463,33.782 r180 top value=10n
C4 "Capacitor" C_1206 10.033,19.939 r180 top value=1u
C5 "Capacitor" C_0805 10.668,22.352 r180 top value=100n
C6 "Capacitor" C_1206 21.082,49.276 r0 bottom value=4.7u
C7 "Capacitor" C_0603 31.369,50.419 r270 top value=680p
C8 "Capacitor" C_0805 21.717,47.244 r0 bottom value=100n
C9 "Capacitor" C_0603 25.019,48.006 r90 top value=1u
C10 "Capacitor" C_0603 24.765,57.15 r90 top value=10n
C11 "Capacitor" C_0603 30.226,57.023 r90 top value=4.7p
C12 "Capacitor" C_1206 15.113,59.436 r90 top value=1u
C13 "Capacitor" C_1206 30.607,60.706 r270 top value=10u
C14 "Capacitor" C_0603 69.596,25.781 r270 top value=33p
C15 "Capacitor" C_0603 74.803,28.194 r90 top value=33p
C16 "Capacitor" C_0603 67.056,30.734 r90 bottom value=100n
C17 "Capacitor" C_0603 79.883,39.497 r180 top value=100n
C18 "Capacitor" C_0603 78.613,36.195 r180 top value=100n
C19 "Capacitor" C_0603 77.724,32.893 r180 top value=100n
C20 "Capacitor" C_0603 62.23,40.64 r0 top value=100n
C21 "Capacitor" C_0603 62.484,35.179 r0 top value=100n
C22 "Capacitor" C_0603 74.041,52.197 r180 top value=100n
C23 "Capacitor" C_0603 66.929,29.718 r90 top value=100n
C24 "Capacitor" C_0603 69.596,28.448 r90 top value=100n
C25 "Capacitor" C_0603 74.041,50.673 r180 top value=100n
C26 "Capacitor" C_1206 80.137,42.799 r180 top value=4.7u
C27 "Capacitor" C_0603 79.883,37.973 r180 top value=100n
C28 "Capacitor" C_1206 76.835,46.863 r270 top value=4.7u
C29 "Capacitor" C_1206 82.296,36.195 r180 top value=4.7u
C30 "Capacitor" C_0603 94.488,42.545 r270 top value=100n
C31 "Capacitor" C_0603 91.694,42.545 r270 top value=100n
C32 "Capacitor" C_0603 86.233,43.688 r180 top value=100n
C33 "Capacitor" C_0603 72.517,29.083 r180 top value=100n
C34 "Capacitor" C_0603 75.057,46.014 r270 top value=100n
C35 "Capacitor" C_0603 70.866,56.896 r90 top value=100n
C36 "Capacitor" C_0603 68.072,50.038 r90 bottom value=100n
C37 "Capacitor" C_0603 69.596,50.038 r90 bottom value=1u
C38 "Capacitor" C_0603 98.806,58.166 r0 top value=18p
C39 "Capacitor" C_0603 113.919,62.23 r90 top value=100n
C40 "Capacitor" C_0603 115.824,58.928 r0 top value=100n
C41 "Capacitor" C_0603 105.41,66.802 r180 top value=100n
C42 "Capacitor" C_0805 99.314,58.547 r90 bottom value=10u
C43 "Capacitor" C_1206 109.093,66.04 r180 top value=4.7u
C44 "Capacitor" C_0603 99.314,50.927 r0 top value=18p
C45 "Capacitor" C_0603 105.41,64.77 r270 top value=10n
C46 "Capacitor" C_0603 115.951,61.722 r0 top value=100n
C47 "Capacitor" C_0603 97.663,58.801 r90 bottom value=100n
C48 "Capacitor" C_0603 115.824,57.023 r0 top value=100n
C49 "Capacitor" C_0805 101.854,64.008 r180 top value=10u
C50 "Capacitor" C_0603 109.728,50.8 r90 top value=22n
C51 "Capacitor" C_0603 121.285,51.308 r270 top value=6.8n
C52 "Capacitor" C_0603 119.761,51.308 r270 top value=6.8n
C53 "Capacitor" C_0603 124.587,51.816 r0 top value=10n
C54 "Capacitor" C_0603 125.603,77.597 r90 top value=10n
C55 "Capacitor" C_0603 124.841,68.072 r180 top value=100n
C56 "Capacitor" C_0805 127.254,77.343 r90 top value=10u
C57 "Capacitor" C_0603 110.109,73.152 r180 top value=100n
C58 "Capacitor" C_0603 110.109,78.232 r0 top value=10n
C59 "Capacitor" C_0805 102.108,76.2 r270 top value=10u
C60 "Capacitor" C_1206 53.594,61.341 r180 top value=10u
C61 "Capacitor" C_1206 37.592,63.627 r0 top value=10u
C62 "Capacitor" C_0603 38.354,58.293 r0 top value=1u
C63 "Capacitor" C_1210 38.1,60.579 r180 top value=22u
C64 "Capacitor" C_0603 49.276,42.799 r0 top value=1u
C65 "Capacitor" C_1206 47.371,63.373 r270 bottom value=10u
C66 "Capacitor" C_0603 49.178,63.333 r270 bottom value=1u
C67 "Capacitor" C_0603 49.276,44.323 r0 top value=1u
C68 "Capacitor" C_0603 33.655,65.786 r90 top value=1n
C69 "Capacitor" C_0603 33.782,57.277 r90 top value=1n
C70 "Capacitor" C_0603 51.562,55.753 r90 top value=1n
C71 "Capacitor" C_0603 53.086,58.166 r90 top value=1n
C72 "Capacitor" C_0603 38.989,75.692 r90 top value=27n
C73 "Capacitor" C_0603 48.895,75.565 r90 top value=27n
C74 "Capacitor" C_0603 56.896,75.819 r90 top value=27n
C75 "Capacitor" C_0603 65.786,75.692 r90 top value=27n
C76 "Capacitor" C_0805 111.887,20.701 r90 bottom value=10u
C77 "Capacitor" C_0805 116.078,10.16 r90 top value=10u
C78 "Capacitor" C_0603 110.363,20.955 r90 bottom value=100n
C79 "Capacitor" C_0603 117.729,10.287 r90 top value=100n
C80 "Capacitor" C_0805 104.521,8.001 r270 top value=100n
C81 "Capacitor" C_0805 100.711,20.066 r90 top value=100n
C82 "Capacitor" C_0603 105.029,23.622 r90 top value=4n
C83 "Capacitor" C_1206 106.68,7.366 r270 top value=10u
C84 "Capacitor" C_1206 102.87,20.32 r90 top value=10u
C85 "Capacitor" C_0603 105.029,14.224 r90 top value=4n
C86 "Capacitor" C_0603 105.029,26.289 r90 top value=100n
C87 "Capacitor" C_0603 105.029,16.891 r90 top value=100n
C88 "Capacitor" C_0603 102.362,26.924 r270 top value=100n
C89 "Capacitor" C_0805 88.138,20.701 r90 top value=100n
C90 "Capacitor" C_0603 59.817,26.289 r0 top value=100n
C91 "Capacitor" C_0603 12.192,58.928 r0 top value=100n
C92 "Capacitor" C_0603 12.192,57.404 r0 top value=1u
C93 "Capacitor" C_0603 63.754,10.414 r180 top value=100n
C94 "Capacitor" C_1206 33.655,23.495 r270 top value="2.2u / 100V"
C95 "Capacitor" C_0603 5.715,67.056 r180 top value=1u
C96 "Capacitor" C_0603 5.715,65.532 r180 top value=100n
C97 "Capacitor" C_0603 31.623,23.094 r270 top value="100n / 100V"
C98 "Capacitor" C_0603 73.152,10.16 r90 top value=100n
C99 "Capacitor" C_0603 77.724,62.611 r90 top value=220p
C100 "Capacitor" C_0603 77.724,58.547 r90 top value=220p
C101 "Capacitor" C_0603 89.154,58.547 r90 top value=220p
C102 "Capacitor" C_0603 89.154,62.484 r90 top value=220p
C103 "Capacitor" C_0603 80.899,62.103 r270 bottom value=100n
C104 "Capacitor" C_0805 31.623,43.307 r270 bottom value=100n
C105 "Capacitor" C_0603 30.607,44.958 r90 top value=10n
C106 "Capacitor" C_0805 47.879,53.086 r0 top value=100n
C107 "Capacitor" C_1206 17.78,38.354 r270 bottom value=4.7u
C108 "Capacitor" C_1210 37.338,42.672 r270 bottom value=22u
C109 "Capacitor" C_1206 20.066,38.354 r270 bottom value=4.7u
C110 "Capacitor" C_1210 34.163,42.621 r270 bottom value=22u
C111 "Capacitor" C_0805 16.499,40.005 r180 top value=470n
C112 "Capacitor" C_0603 29.337,40.259 r0 top value=2.2u
C113 "Capacitor" C_0805 29.083,37.846 r270 top value=470n
C114 "Capacitor" C_0603 29.337,41.783 r180 top value=1u
C115 "Capacitor" C_0603 34.925,50.038 r90 top value=3.3n
C116 "Capacitor" C_0603 29.083,44.958 r270 top value=1p
C117 "Capacitor" C_1210 40.005,26.924 r90 top value=47u
C118 "Capacitor" C_0805 33.528,40.767 r180 top value=100n
C119 "Capacitor" C_1210 43.18,26.924 r90 top value=47u
C120 "Capacitor" C_1206 34.036,38.735 r180 top value=10u
C121 "Capacitor" C_0805 45.72,27.432 r90 top value=470n
C122 "Capacitor" C_0805 56.642,44.958 r270 top value=100n
C123 "Capacitor" C_0603 40.386,40.259 r180 top value=2.2u
C124 "Capacitor" C_0603 40.386,38.735 r180 top value=2.2u
C125 "Capacitor" C_0603 52.324,35.687 r90 top value=2.2u
C126 "Capacitor" C_0603 50.8,38.227 r270 top value=2.2u
CR1 "5.0SMDJ36CA" 5.0SMDJSERIES_LTF 10.668,13.462 r180 top
CR2 "5.0SMDJ36CA" 5.0SMDJSERIES_LTF 27.94,6.477 r270 top
CR3 "STPST10H100SBYTR" DPAK_STM 23.622,18.288 r0 top
CR4 "SMBJ12CA" SMBJSERIES_LTF 37.973,71.882 r0 top
CR5 "SMBJ12CA" SMBJSERIES_LTF 48.054,71.882 r0 top
CR6 "SMBJ12CA" SMBJSERIES_LTF 58.039,72.009 r0 top
CR7 "SMBJ12CA" SMBJSERIES_LTF 67.516,72.009 r0 top
CR8 "CDSOD323-T12C" CDSOD_BIDI_BRN 40.005,78.359 r180 top
CR9 "CDSOD323-T12C" CDSOD_BIDI_BRN 49.657,78.359 r180 top
CR10 "CDSOD323-T12C" CDSOD_BIDI_BRN 58.293,78.232 r180 top
CR11 "CDSOD323-T12C" CDSOD_BIDI_BRN 67.31,78.232 r180 top
CR12 "SMBJ15A" DO-214AASMB_J-BEND_LTF 89.408,10.668 r0 top
CR13 "BAS70-04LT1G" SOT-23TO-236_318-08_ONS 89.662,16.129 r180 top
CR14 "SMBJ15A" DO-214AASMB_J-BEND_LTF 97.79,10.541 r0 top
CR15 "BAS70-04LT1G" SOT-23TO-236_318-08_ONS 98.425,16.002 r180 top
CR16 "SMBJ36CA" SMBJSERIES_LTF 75.184,75.105 r270 top
CR17 "SMBJ36CA" SMBJSERIES_LTF 80.264,75.105 r270 top
CR18 "SMBJ36CA" SMBJSERIES_LTF 85.344,75.057 r270 top
CR19 "SMBJ36CA" SMBJSERIES_LTF 90.678,75.057 r270 top
D1 "Schottky Diode" SMC 8.001,37.211 r0 top
D2 "Schottky Diode" D_POWERDI123 28.194,61.595 r270 top
D3 "Light-Emitting Diode" LED_PLCC2_3528 31.039,78.105 r0 top
D4 "Light-Emitting Diode" LED_PLCC2_3528 25.273,78.105 r0 top
D5 "Light-Emitting Diode" LED_PLCC2_3528 19.558,78.105 r0 top
D6 "Light-Emitting Diode" LED_PLCC2_3528 13.843,78.105 r0 top
D7 "Light-Emitting Diode" LED_PLCC2_3528 25.4,25.4 r0 top
D8 "Light-Emitting Diode" LED_PLCC2_3528 97.663,32.258 r0 top
D9 "Light-Emitting Diode" LED_PLCC2_3528 88.265,32.258 r0 top
D10 "Light-Emitting Diode" LED_PLCC2_3528 97.663,38.227 r180 top
D11 "Light-Emitting Diode" LED_PLCC2_3528 88.265,38.227 r180 top
D12 "Light-Emitting Diode" LED_PLCC2_3528 97.282,74.041 r0 top
F1 "Fuse" 0454SERIES_LTF 18.161,11.303 r270 top
F2 "0454005.MR" 0454SERIES_LTF 22.606,6.985 r270 top
F3 "PTS120630V012" FUSE_PTS1206_EAT 36.068,76.962 r90 top
F4 "PTS120630V012" FUSE_PTS1206_EAT 44.958,76.981 r90 top
F5 "PTS120630V012" FUSE_PTS1206_EAT 54.61,77.089 r90 top
F6 "PTS120630V012" FUSE_PTS1206_EAT 63.119,77.089 r90 top
FB1 "180R@100MHz" L_0805 13.843,19.054 r90 top value=0
FB2 "120R 100MHz" L_0805 120.523,60.071 r90 top
J1 "USB4145-03-0230-C" CONN_USB4145-03-0230-C_GCT 85.471,50.038 r90 top
J2 "TMJD4012BENL" CONN12_TMJD4012BENL_TAL 119.507,35.306 r0 top
J3 "" "CON: JUMPER x1" 104.775,79.186 r270 top
J4 "Terminal connector, 3pin, 3.5mm, 300VAC, 10A" "CON: DG350-3.5-03P" 98.877,86.106 r180 top
J5 "Terminal connector, 6pin, 3.5mm, 300VAC, 10A" "CON: 15EDGRC-3.5-08 (or 691322110008)" 49.08,84.738 r0 top
J6 "" "CON: JUMPER x1" 41.021,75.057 r180 top
J7 "" "CON: JUMPER x1" 51.054,75.057 r180 top
J8 "" "CON: JUMPER x1" 58.928,75.184 r180 top
J9 "" "CON: JUMPER x1" 67.883,75.057 r180 top
J10 "Terminal connector, 2pin, 3.5mm, 300VAC, 10A" "CON: DG350-3.5-02P" 88.952,4.17 r0 top
J11 "Terminal connector, 2pin, 3.5mm, 300VAC, 10A" "CON: DG350-3.5-02P" 97.207,4.17 r0 top
L1 "Inductor" L_XGL4020 16.494,53.925 r180 top value=4.7u
L2 "Inductor" L_XGL4020 18.542,61.849 r270 top value=4.7u
L3 "Inductor" L_AOTA_B201610 79.756,45.466 r0 top value=3.3u
L4 "Inductor" L_XFL4020 44.196,44.069 r90 top value=2.2u
L5 "Inductor" L_XGL6030 33.02,32.766 r0 top value=6.8u
MOSFET1 "TLP383(GR-TPL,E" "4pin SO6L_TOS" 44.577,12.319 r180 top
MOSFET2 "TLP383(GR-TPL,E" "4pin SO6L_TOS" 44.577,19.304 r180 top
MOSFET3 "TLP383(GR-TPL,E" "4pin SO6L_TOS" 77.724,8.509 r270 top
MOSFET4 "TLP383(GR-TPL,E" "4pin SO6L_TOS" 44.577,5.715 r180 top
R1 "Resistor" R_0603 20.955,30.48 r180 top value=12.4k
R2 "Resistor" R_0805 16.637,34.671 r270 top value=150k
R3 "Resistor" R_0805 18.542,34.798 r270 top value=10k
R4 "Resistor" R_0805 20.701,32.131 r180 top value=7.32k
R5 "Resistor" R_0805 20.828,28.321 r0 top value=402k
R6 "Resistor" R_0805 20.574,25.908 r90 top value=30.1K
R7 "Resistor" R_0805 14.605,25.781 r0 top value=866K
R8 "Resistor" R_0805 17.907,25.781 r0 top value=113K
R9 "Resistor" R_0805 28.956,50.038 r180 top value=36.5K
R10 "Resistor" R_0805 16.383,50.292 r0 top value=0
R11 "Resistor" R_0805 26.543,57.277 r90 top value=20K
R12 "Resistor" R_0805 29.591,54.102 r0 top value=1M
R13 "Resistor" R_0805 22.225,56.515 r180 top value=0
R14 "Resistor" R_0805 28.448,57.277 r90 top value=120K
R15 "Resistor" R_0603 58.293,34.544 r180 top value=10k
R16 "Resistor" R_0603 58.293,31.75 r180 top value=10k
R17 "Resistor" R_0603 60.198,29.21 r180 top value=10k
R18 "Resistor" R_0603 73.533,45.847 r90 top value=27
R19 "Resistor" R_0603 72.136,45.847 r90 top value=27
R20 "Resistor" R_0603 79.756,41.021 r0 top value=33
R21 "Resistor" R_0603 16.499,41.91 r180 top value=30k
R22 "Resistor" R_0603 18.669,42.545 r90 top value=2.2k
R23 "Resistor" R_0603 90.297,42.545 r90 top value=10k
R24 "Resistor" R_0603 88.9,42.545 r90 top value=2.2k
R25 "Resistor" R_0603 85.471,42.291 r180 top value=2.7k
R26 "Resistor" R_0603 85.217,38.862 r270 top value=3.3k
R27 "Resistor" R_0603 53.848,54.356 r0 top value=1K
R28 "Resistor" R_0603 56.007,49.403 r90 top value=10K
R29 "Resistor" R_0603 71.12,52.705 r90 top value=10K
R30 "Resistor" R_0603 64.897,44.831 r180 top value=0
R31 "Resistor" R_0603 59.944,49.657 r0 top value=10K
R32 "Resistor" R_0603 63.119,42.418 r0 top value=10k
R33 "Resistor" R_0603 98.806,56.769 r0 top value=1M
R34 "Resistor" R_0603 101.473,52.324 r90 top value=0
R35 "Resistor" R_0603 115.824,60.325 r180 top value=12.4k
R36 "Resistor" R_0603 104.775,49.657 r180 top value=10k
R37 "Resistor" R_0603 104.775,52.451 r180 top value=10k
R38 "Resistor" R_0603 104.775,51.054 r180 top value=10k
R39 "Resistor" R_0603 119.761,53.975 r270 top value=3.3
R40 "Resistor" R_0603 121.158,53.975 r270 top value=3.3
R41 "Resistor" R_0603 116.84,53.975 r270 top value=3.3
R42 "Resistor" R_0603 81.407,51.689 r0 top value=68k
R43 "Resistor" R_0603 80.01,53.086 r0 top value=100k
R44 "Resistor" R_0603 118.364,52.578 r270 top value=49.9
R45 "Resistor" R_0603 122.555,52.578 r270 top value=49.9
R46 "Resistor" R_0603 112.522,52.197 r90 top value=49.9
R47 "Resistor" R_0603 80.518,48.641 r0 top value=5.1k
R48 "Resistor" R_0603 115.443,53.975 r270 top value=3.3
R49 "Resistor" R_0603 89.789,50.8 r180 top value=5.1k
R50 "Resistor" R_0603 111.125,52.197 r90 top value=10
R51 "Resistor" R_0603 113.919,52.197 r90 top value=49.9
R52 "Resistor" R_0603 100.711,60.198 r180 top value=330
R53 "Resistor" R_0603 100.711,61.595 r180 top value=330
R54 "Resistor" R_0603 125.857,72.136 r270 top value=10k
R55 "Resistor" R_0603 124.206,76.2 r90 top value=10k
R56 "Resistor" R_0603 110.236,70.739 r180 top value=0
R57 "Resistor" R_0603 103.378,81.026 r90 top value=0
R58 "Resistor" R_0603 106.172,81.026 r90 top value=0
R59 "Resistor" R_0603 106.299,78.359 r270 top value=0
R60 "Resistor" R_0603 104.775,81.026 r90 top value=120
R61 "Resistor" R_0603 60.198,30.607 r0 top value=10K
R62 "Resistor" R_0603 40.64,64.008 r270 top value=1K
R63 "Resistor" R_0603 34.036,69.723 r270 top value=100
R64 "Resistor" R_0603 44.196,69.723 r270 top value=100
R65 "Resistor" R_0603 56.261,69.088 r0 top value=100
R66 "Resistor" R_0603 65.786,69.088 r0 top value=100
R67 "Resistor" R_0603 58.293,33.147 r0 top value=10K
R68 "Resistor" R_0603 41.021,76.581 r0 top value=200
R69 "Resistor" R_0603 50.927,76.581 r0 top value=200
R70 "Resistor" R_0603 58.928,76.708 r0 top value=200
R71 "Resistor" R_0603 67.945,76.581 r0 top value=200
R72 "Resistor" R_0603 36.957,67.437 r270 top value=1K
R73 "Resistor" R_0603 42.418,72.771 r270 top value=1K
R74 "Resistor" R_0603 53.975,69.088 r270 top value=1K
R75 "Resistor" R_0603 52.705,72.009 r270 top value=1K
R76 "Resistor" R_0603 62.23,68.707 r270 top value=1K
R77 "Resistor" R_0603 62.103,72.39 r270 top value=1K
R78 "Resistor" R_0603 72.517,67.818 r270 top value=1K
R79 "Resistor" R_0603 70.866,75.946 r270 top value=1K
R80 "Resistor" R_0603 38.354,67.437 r90 top value=0
R81 "Resistor" R_0603 52.578,69.088 r90 top value=0
R82 "Resistor" R_0603 63.627,68.707 r90 top value=0
R83 "Resistor" R_0603 71.12,67.818 r90 top value=0
R84 "Resistor" R_0603 85.725,14.351 r90 top value=10k
R85 "Resistor" R_0603 92.202,14.351 r270 top value=0
R86 "Resistor" R_0603 87.122,14.351 r270 top value=33
R87 "Resistor" R_0603 104.521,28.321 r180 top value=15k
R88 "Resistor" R_0603 102.997,17.526 r180 top value=15k
R89 "Resistor" R_0603 100.584,14.224 r270 top value=0
R90 "Resistor" R_0603 94.107,14.224 r90 top value=10k
R91 "Resistor" R_0603 95.504,14.224 r270 top value=33
R92 "Resistor" R_0603 61.722,32.385 r0 top value=10K
R93 "Resistor" R_0603 68.326,28.702 r90 top value=10K
R94 "Resistor" R_0603 60.833,27.813 r180 top value=100K
R95 "Resistor" R_0603 62.738,26.162 r270 top value=100K
R96 "Resistor" R_0603 52.07,11.049 r180 top value=390
R97 "Resistor" R_0603 52.07,18.034 r180 top value=390
R98 "CRCW25121K50FKEGHP" RES_0FKEGHP_VIS 31.242,71.882 r270 top
R99 "CRCW25121K50FKEGHP" RES_0FKEGHP_VIS 25.781,71.882 r270 top
R100 "CRCW25121K50FKEGHP" RES_0FKEGHP_VIS 20.066,71.882 r270 top
R101 "CRCW25121K50FKEGHP" RES_0FKEGHP_VIS 14.478,71.882 r270 top
R102 "Resistor" R_0603 53.34,14.859 r180 top value=22k
R103 "Resistor" R_0603 39.37,22.86 r270 top value=22k
R104 "Resistor" R_0603 77.343,17.653 r0 top value=2.2k
R105 "Resistor" R_0603 53.213,5.08 r270 top value=2.2k
R106 "Resistor" R_0603 58.928,18.923 r0 top value=220k
R107 "Resistor" R_0603 12.446,64.389 r0 top value=7.5K
R108 "Resistor" R_0603 12.446,62.992 r0 top value=24.0K
R109 "Resistor" R_0603 77.978,19.685 r90 top value=220k
R110 "Resistor" R_0603 64.135,26.162 r90 top value=10k
R111 "Resistor" R_0603 65.532,26.162 r90 top value=10k
R112 "Resistor" R_0603 76.2,62.611 r90 top value=680
R113 "Resistor" R_0603 76.2,58.547 r90 top value=680
R114 "Resistor" R_0603 90.678,58.547 r90 top value=680
R115 "Resistor" R_0603 90.678,62.484 r90 top value=680
R116 "Resistor" R_0603 72.644,80.772 r270 top value=3.9K
R117 "Resistor" R_0603 79.121,80.645 r270 top value=3.9K
R118 "Resistor" R_0603 85.09,80.645 r270 top value=3.9K
R119 "Resistor" R_0603 90.932,80.772 r270 top value=3.9K
R120 "Resistor" R_0603 71.247,80.772 r90 top value=3.9K
R121 "Resistor" R_0603 77.724,80.645 r90 top value=3.9K
R122 "Resistor" R_0603 83.693,80.645 r90 top value=3.9K
R123 "Resistor" R_0603 89.535,80.772 r90 top value=3.9K
R124 "Resistor" R_0603 81.915,57.277 r180 top value=10K
R125 "Resistor" R_0603 92.583,59.436 r90 top value=10K
R126 "Resistor" R_0603 74.295,59.309 r90 top value=10K
R127 "Resistor" R_0603 81.915,55.88 r0 top value=56K
R128 "Resistor" R_0603 88.9,56.134 r180 top value=10K
R129 "Resistor" R_0603 72.898,59.309 r270 top value=56K
R130 "Resistor" R_0603 95.504,58.928 r90 top value=56K
R131 "Resistor" R_0603 94.107,60.198 r270 top value=56K
R132 "Resistor" R_0603 78.232,56.515 r180 top value=165K
R133 "Resistor" R_0603 74.295,62.611 r90 top value=165K
R134 "Resistor" R_0603 93.98,57.531 r270 top value=165K
R135 "Resistor" R_0603 92.71,62.865 r90 top value=165K
R136 "Resistor" R_0603 71.501,62.611 r90 top value=47
R137 "Resistor" R_0603 72.898,62.611 r90 top value=47
R138 "Resistor" R_0603 93.345,64.897 r180 top value=47
R139 "Resistor" R_0603 94.107,62.865 r90 top value=47
R140 "Resistor" R_0603 91.313,30.226 r90 top value=100
R141 "Resistor" R_0603 82.55,30.734 r90 top value=100
R142 "Resistor" R_0603 98.679,34.544 r0 top value=100
R143 "Resistor" R_0603 89.281,34.544 r0 top value=100
R144 "Resistor" R_0603 100.076,68.199 r180 top value=100
R145 "Resistor" R_0603 91.948,32.258 r180 top value=100k
R146 "Resistor" R_0603 84.582,31.369 r180 top value=100k
R147 "Resistor" R_0603 98.679,35.941 r0 top value=100k
R148 "Resistor" R_0603 89.281,35.941 r0 top value=100k
R149 "Resistor" R_0603 100.076,69.596 r180 top value=100k
R150 "Resistor" R_0603 28.448,25.654 r90 top value=1k
R151 "Resistor" R_0603 89.281,29.972 r180 top value=1k
R152 "Resistor" R_0603 94.488,37.973 r90 top value=1k
R153 "Resistor" R_0603 85.217,36.322 r270 top value=1k
R154 "Resistor" R_0603 100.33,73.279 r270 top value=1k
R155 "Resistor" R_0603 100.711,31.877 r270 top value=1k
R156 "Resistor" R_0805 40.259,53.075 r270 top value=150K
R157 "Resistor" R_0805 42.164,53.075 r270 top value=470K
R158 "Resistor" R_0805 44.958,51.435 r270 top value=10K
R159 "Resistor" R_0805 50.673,47.244 r180 top value=100K
R160 "Resistor" R_0805 44.196,48.387 r180 top value=10K
R161 "Resistor" R_0805 18.415,45.593 r270 top value=0
R162 "Resistor" R_0805 37.719,52.07 r180 top value=0
R163 "Resistor" R_0805 37.719,53.975 r180 top value=0
R164 "Resistor" R_0805 20.32,45.593 r270 top value=10K
R165 "Resistor" R_0805 32.385,45.212 r270 top value=80.6K
R166 "Resistor" R_0805 16.637,38.1 r0 top value=0
R167 "Resistor" R_0805 59.944,47.625 r180 top value=100K
R168 "Resistor" R_0805 53.594,50.8 r0 top value=0
R169 "Resistor" R_0805 53.594,52.705 r0 top value=0
R170 "Resistor" R_0805 56.007,36.322 r90 top value=10K
R171 "Resistor" R_0805 33.02,42.672 r0 top value=0
R172 "Resistor" R_0805 27.305,45.466 r90 top value=100K
R173 "Resistor" R_0805 37.338,44.069 r270 top value=0
R174 "Resistor" R_0805 25.4,45.466 r90 top value=23.4K
R175 "Resistor" R_0805 60.96,39.116 r180 top value=100K
R176 "Resistor" R_0805 60.198,37.211 r180 top value=100K
R177 "Resistor" R_0805 42.672,32.258 r0 top value=0
R178 "Resistor" R_0805 41.148,35.814 r0 top value=0
R179 "Resistor" R_0805 113.792,6.985 r90 top value=0
R180 "Resistor" R_0805 59.309,44.323 r90 top value=0
R181 "Resistor" R_0805 51.689,28.194 r270 top value=0
R182 "Resistor" R_0805 92.329,27.178 r180 top value=47K
R183 "Resistor" R_0805 49.022,27.305 r0 top value=47K
R_RP1 "Resistor" R_0603 93.091,42.545 r90 top value=1k
R_RP2 "Resistor" R_0603 87.503,41.021 r90 top value=1k
R_RP3 "Resistor" R_0603 85.471,40.894 r0 top value=1k
SW1 "B3F-1000" SW_B3F-1000 59.436,55.372 r90 top
TP1 "Test point, Keystone, 5001" "CON: 5000 (Keystone)" 24.638,30.861 r0 top
TP2 "Test point, Keystone, 5001" "CON: 5000 (Keystone)" 123.698,25.4 r0 top
TP3 "Test point, Keystone, 5001" "CON: 5000 (Keystone)" 68.961,63.754 r0 top
TP4 "Test point, Keystone, 5001" "CON: 5000 (Keystone)" 81.915,64.897 r0 top
TP5 "Test point, Keystone, 5001" "CON: 5000 (Keystone)" 85.09,64.897 r0 top
TP6 "Test point, Keystone, 5001" "CON: 5000 (Keystone)" 96.139,62.992 r0 top
U1 "TPS26600RHFT" RHF0024A 15.753,30.075 r0 top
U2 "LT8362EMSE#PBF" MSE_16A_ADI 24.754,52.121 r90 top
U3 "RP2350B" QFN40P1000X1000X85-81N 70.736,37.595 r0 top
U4 "W25Q128JVBIQ" TFBGA_128JVBIQ_WIN 66.818,56.483 r0 top
U5 "APS6404L-3SQR-SN" APS6404L-3SQR-SN_APY 66.802,48.387 r0 top
U6 "W5500" 48LQFP_W5500_WIZ 107.315,58.166 r180 top
U7 "TPD2EUSB30ADRTR" DRT3 81.407,50.038 r90 top
U8 "ISOW1432DFMR" SOIC_2DFM_TEX 117.475,73.787 r180 top
U9 "SM712.TCT" SOT23_SEM 100.777,80.264 r180 top
U10 "ADS8688IDBTR" DBT38_TEX 46.228,60.833 r0 top
U11 "OPA2991IDR" D0008A-IPC_A 94.488,21.082 r180 top
U12 "AD5422BREZ" RE_24_ADI 109.703,23.499 r180 top
U13 "AD5422BREZ" RE_24_ADI 109.703,14.101 r180 top
U14 "SN74LVC2G04DBVR" DBV6 98.298,26.162 r0 top
U15 "SN74LVC2G08DCTR" DCT8 55.372,24.892 r0 top
U16 "MAX22190ATJ+" 21-0140L_T3255-5_MXM 7.394,60.996 r0 top
U17 "IPS2050HTR" POWERSSO-24_STM 68.072,16.808 r0 top
U18 "BAS70LT1G" SOT-23_ONS 75.692,69.647 r0 top
U19 "BAS70LT1G" SOT-23_ONS 80.264,69.596 r0 top
U20 "BAS70LT1G" SOT-23_ONS 85.471,69.596 r0 top
U21 "BAS70LT1G" SOT-23_ONS 90.805,69.596 r0 top
U22 "TLV9034PWR" PW0014A-IPC_A 83.439,60.579 r0 top
U23 "2N7002LT1G" SOT-23_3L_ONS 93.98,29.845 r270 top
U24 "2N7002LT1G" SOT-23_3L_ONS 85.852,28.956 r270 top
U25 "2N7002LT1G" SOT-23_3L_ONS 101.854,35.687 r0 top
U26 "2N7002LT1G" SOT-23_3L_ONS 92.456,35.306 r0 top
U27 "2N7002LT1G" SOT-23_3L_ONS 96.774,70.612 r90 top
U28 "TPS3851H33EDRBR" DRB0008A 49.474,50.168 r0 top
U29 "TPS62130RGTR" RGT16_1P7X1P7 38.977,48.211 r180 top
U30 "LM76003RNPR" RNP0030B 24.499,40.365 r180 top
U31 "SN74LVC2G08DCTR" DCT8 55.245,41.402 r0 top
U32 "TPS7A2033PDBVR" DBV0005A-IPC_A 49.015,33.975 r0 top
U33 "TPS7A2050PDBVR" DBV0005A-IPC_A 47.879,37.973 r0 top
X1 "Terminal connector, 2pin, 3.5mm, 300VAC, 10A" "CON: DG350-3.5-02P" 16.284,4.064 r0 top
X2 "Connector, 4pin, 2.54mm, 250VAC, 3A" "CON: WF-04" 79.153,30.569 r270 top
X3 "Terminal connector, 6pin, 3.5mm, 300VAC, 10A" "CON: DG350-3.5-06P" 22.793,86 r180 top
X4 "Terminal connector, 2pin, 3.5mm, 300VAC, 10A" "CON: DG350-3.5-02P" 68.862,4.064 r0 top
X5 "Terminal connector, 2pin, 3.5mm, 300VAC, 10A" "CON: DG350-3.5-02P" 60.48,4.064 r0 top
X6 "Terminal connector, 6pin, 3.5mm, 300VAC, 10A" "CON: DG350-3.5-06P" 75.481,86.106 r180 top
XTAL1 "ABM8-12.000MHZ-B2-T" ABM8_ABR 72.263,26.416 r180 top
XTAL2 "445I23D25M00000" XTAL_445I23D25M00000_CTS 97.536,53.848 r0 top

## Footprints (in the part's own frame and the unit in brackets; to place one, negate y for a bottom-side part, rotate by r counter-clockwise, add the part's x,y. Pads: shape width x height; smd on the part's side, far side on the other; paste and mask are expansions set on the pad)
"4pin SO6L_TOS" [mil]
  rect 59.56x20.97 smd paste+0 mask+0: 1(-185,50) 3(-185,-50) 4(185,-50) 6(185,50)
  silkscreen extent -152,-81 152,81, body extent -201,-76 201,76, height 87
5.0SMDJSERIES_LTF [mil]
  rect 85.59x126 smd paste+0 mask+0: 1(-123.11,0) 2(123.11,0)
  Top Layer keep-out region: -75,-65 -75,65 75,65 75,-65
  Top Layer keep-out region: -158,65 -158,120.5 158,120.5 158,65
  Top Layer keep-out region: -158,-120.5 -158,-65 158,-65 158,-120.5
  Keep-Out Layer region: -75,-65 -75,65 75,65 75,-65
  silkscreen extent -230,-128 165,128, body extent -160,-123 160,123, height 105
21-0140L_T3255-5_MXM [mm]
  rect 0.808x0.255 smd paste+0 mask+0: 1(-2.449,1.75) 2(-2.449,1.25) 3(-2.449,0.75) 4(-2.449,0.25) 5(-2.449,-0.25) 6(-2.449,-0.75) 7(-2.449,-1.25) 8(-2.449,-1.75) 17(2.449,-1.75) 18(2.449,-1.25) 19(2.449,-0.75) 20(2.449,-0.25) 21(2.449,0.25) 22(2.449,0.75) 23(2.449,1.25) 24(2.449,1.75)
  rect 0.255x0.808 smd paste+0 mask+0: 9(-1.75,-2.449) 10(-1.25,-2.449) 11(-0.75,-2.449) 12(-0.25,-2.449) 13(0.25,-2.449) 14(0.75,-2.449) 15(1.25,-2.449) 16(1.75,-2.449) 25(1.75,2.449) 26(1.25,2.449) 27(0.75,2.449) 28(0.25,2.449) 29(-0.25,2.449) 30(-0.75,2.449) 31(-1.25,2.449) 32(-1.75,2.449)
  rect 3.2x3.2 smd paste-1.6 mask+0: 33(0,0)
  silkscreen extent -2.68,-3.36 3.36,3.36, body extent -2.55,-2.55 2.55,2.55, height 0.81
48LQFP_W5500_WIZ [mil]
  rect 57.56x11 smd paste+0 mask+0: 1(-166,108.27) 2(-166,88.58) 3(-166,68.9) 4(-166,49.21) 5(-166,29.53) 6(-166,9.84) 7(-166,-9.84) 8(-166,-29.53) 9(-166,-49.21) 10(-166,-68.9) 11(-166,-88.58) 12(-166,-108.27) 25(166,-108.27) 26(166,-88.58) 27(166,-68.9) 28(166,-49.21) 29(166,-29.53) 30(166,-9.84) 31(166,9.84) 32(166,29.53) 33(166,49.21) 34(166,68.9) 35(166,88.58) 36(166,108.27)
  rect 11x57.56 smd paste+0 mask+0: 13(-108.27,-166) 14(-88.58,-166) 15(-68.9,-166) 16(-49.21,-166) 17(-29.53,-166) 18(-9.84,-166) 19(9.84,-166) 20(29.53,-166) 21(49.21,-166) 22(68.9,-166) 23(88.58,-166) 24(108.27,-166) 37(108.27,166) 38(88.58,166) 39(68.9,166) 40(49.21,166) 41(29.53,166) 42(9.84,166) 43(-9.84,166) 44(-29.53,166) 45(-49.21,166) 46(-68.9,166) 47(-88.58,166) 48(-108.27,166)
  silkscreen extent -215,-215 215,215, body extent -181,-181 181,181, height 63
0454SERIES_LTF [mil]
  rect 70.78x106 smd paste+0 mask+0: 1(-98.39,0) 2(98.39,0)
  Top Layer keep-out region: -55,-51 -55,51 55,51 55,-51
  Keep-Out Layer region: -55,-53 -55,53 55,53 55,-53
  silkscreen extent -170,-58 51,58, body extent -120,-53 120,53, height 106
ABM8_ABR [mm]
  rect 1.189x0.941 smd paste+0 mask+0: 1(-1.052,1.05) 2(-1.052,-1.05) 3(1.052,-1.05) 4(1.052,1.05)
  silkscreen extent -3.9,-1.83 1.47,1.83, body extent -1.35,-1.7 1.35,1.7, height 0.81
APS6404L-3SQR-SN_APY [mm]
  rect 1.356x0.558 smd paste+0 mask+0: 1(-2.672,1.905) 2(-2.672,0.635) 3(-2.672,-0.635) 4(-2.672,-1.905) 5(2.672,-1.905) 6(2.672,-0.635) 7(2.672,0.635) 8(2.672,1.905)
  silkscreen extent -2.12,-2.63 2.12,2.63, body extent -3,-2.5 3,2.5, height 1.76
C_0603 [mm] "Chip Capacitor, 2-Leads, Body 1.60x0.80mm, IPC Medium Density"
  rrect50% 0.85x0.95 smd: 1(-0.675,0) 2(0.675,0)
  body extent -0.87,-0.48 0.87,0.48, height 0.9
C_0805 [mm] "Chip Capacitor, 2-Leads, Body 2.00x1.25mm, IPC Medium Density"
  rrect50% 1.2x1.4 smd: 1(-0.85,0) 2(0.85,0)
  body extent -1.1,-0.72 1.1,0.72, height 1.45
C_1206 [mm] "Chip Capacitor, 2-Leads, Body 3.20x1.60mm, IPC Medium Density"
  rrect50% 1x1.8 smd: 1(-1.575,0) 2(1.575,0)
  silkscreen extent -0.7,-0.8 0.7,0.8, body extent -1.75,-0.9 1.75,0.9, height 1.8
C_1210 [mm] "Chip Capacitor, 2-Leads, Body 3.20x2.50mm, IPC Medium Density"
  rrect50% 1.05x2.7 smd: 1(-1.575,0) 2(1.575,0)
  silkscreen extent -0.65,-1.25 0.65,1.25, body extent -1.8,-1.4 1.8,1.4, height 2.7
C_SMD_Al_D [mm] "Aluminum Electrolytic Capacitor, Body 6.60x6.60x6.10mm, IPC Medium Density"
  rrect50% 3.15x1.6 smd: 1(-2.85,0) 2(2.85,0)
  silkscreen extent -3.4,-3.4 3.4,3.4, body extent -3.85,-3.4 3.85,3.4, height 6.1
CDSOD_BIDI_BRN [mil]
  rect 45.56x18.36 smd paste+0 mask+0: 1(-44,0) 2(44,0)
  Keep-Out Layer region: -19.22,-26.5 -19.22,26.5 19.22,26.5 19.22,-26.5
  silkscreen extent -43,-34 43,34, body extent -53,-29 53,29, height 45
"CON: 15EDGRC-3.5-08 (or 691322110008)" [mm] "Horizontal PCB Header, pitch 3.5mm, 08p"
  round 2.1 hole 1.4: 1(-12.25,3.4) 2(-8.75,3.4) 3(-5.25,3.4) 4(-1.75,3.4) 5(1.75,3.4) 6(5.25,3.4) 7(8.75,3.4) 8(12.25,3.4)
  round 0.5 on Top Overlay: ""(-14,-3.9)
  silkscreen extent -14.7,-4.6 14.7,4.6, body extent -14.7,-4.6 14.7,4.6, height 7.3
"CON: 5000 (Keystone)" [mm]
  round 1.6 hole 1: 1(0,0)
  silkscreen extent -1.3,-1.3 1.3,1.3, body extent -1.27,-1.27 1.27,1.27, height 4.94
"CON: DG350-3.5-02P" [mm]
  round 2.2 hole 1.2: 1(-1.75,0) 2(1.75,0)
  round 0.5 on Top Overlay: ""(-3.1,-2.9)
  silkscreen extent -3.6,-3.4 3.6,3.4, body extent -4,-3.4 4,3.4, height 8.4